# Altium PCB rp2350_led_control_pcb.PcbDoc (part 1 of 4)
Units mm, origin at the board's own origin, x right, y up, seen from the top; angles counter-clockwise.
Board outline 143.9 x 131.3 mm, 4 copper layers (L1(SIG), L2(GND), L3(PWR), L4(SIG)), stack 1.591 mm thick; 168 components, 192 nets, 814 pads, 1003 vias.
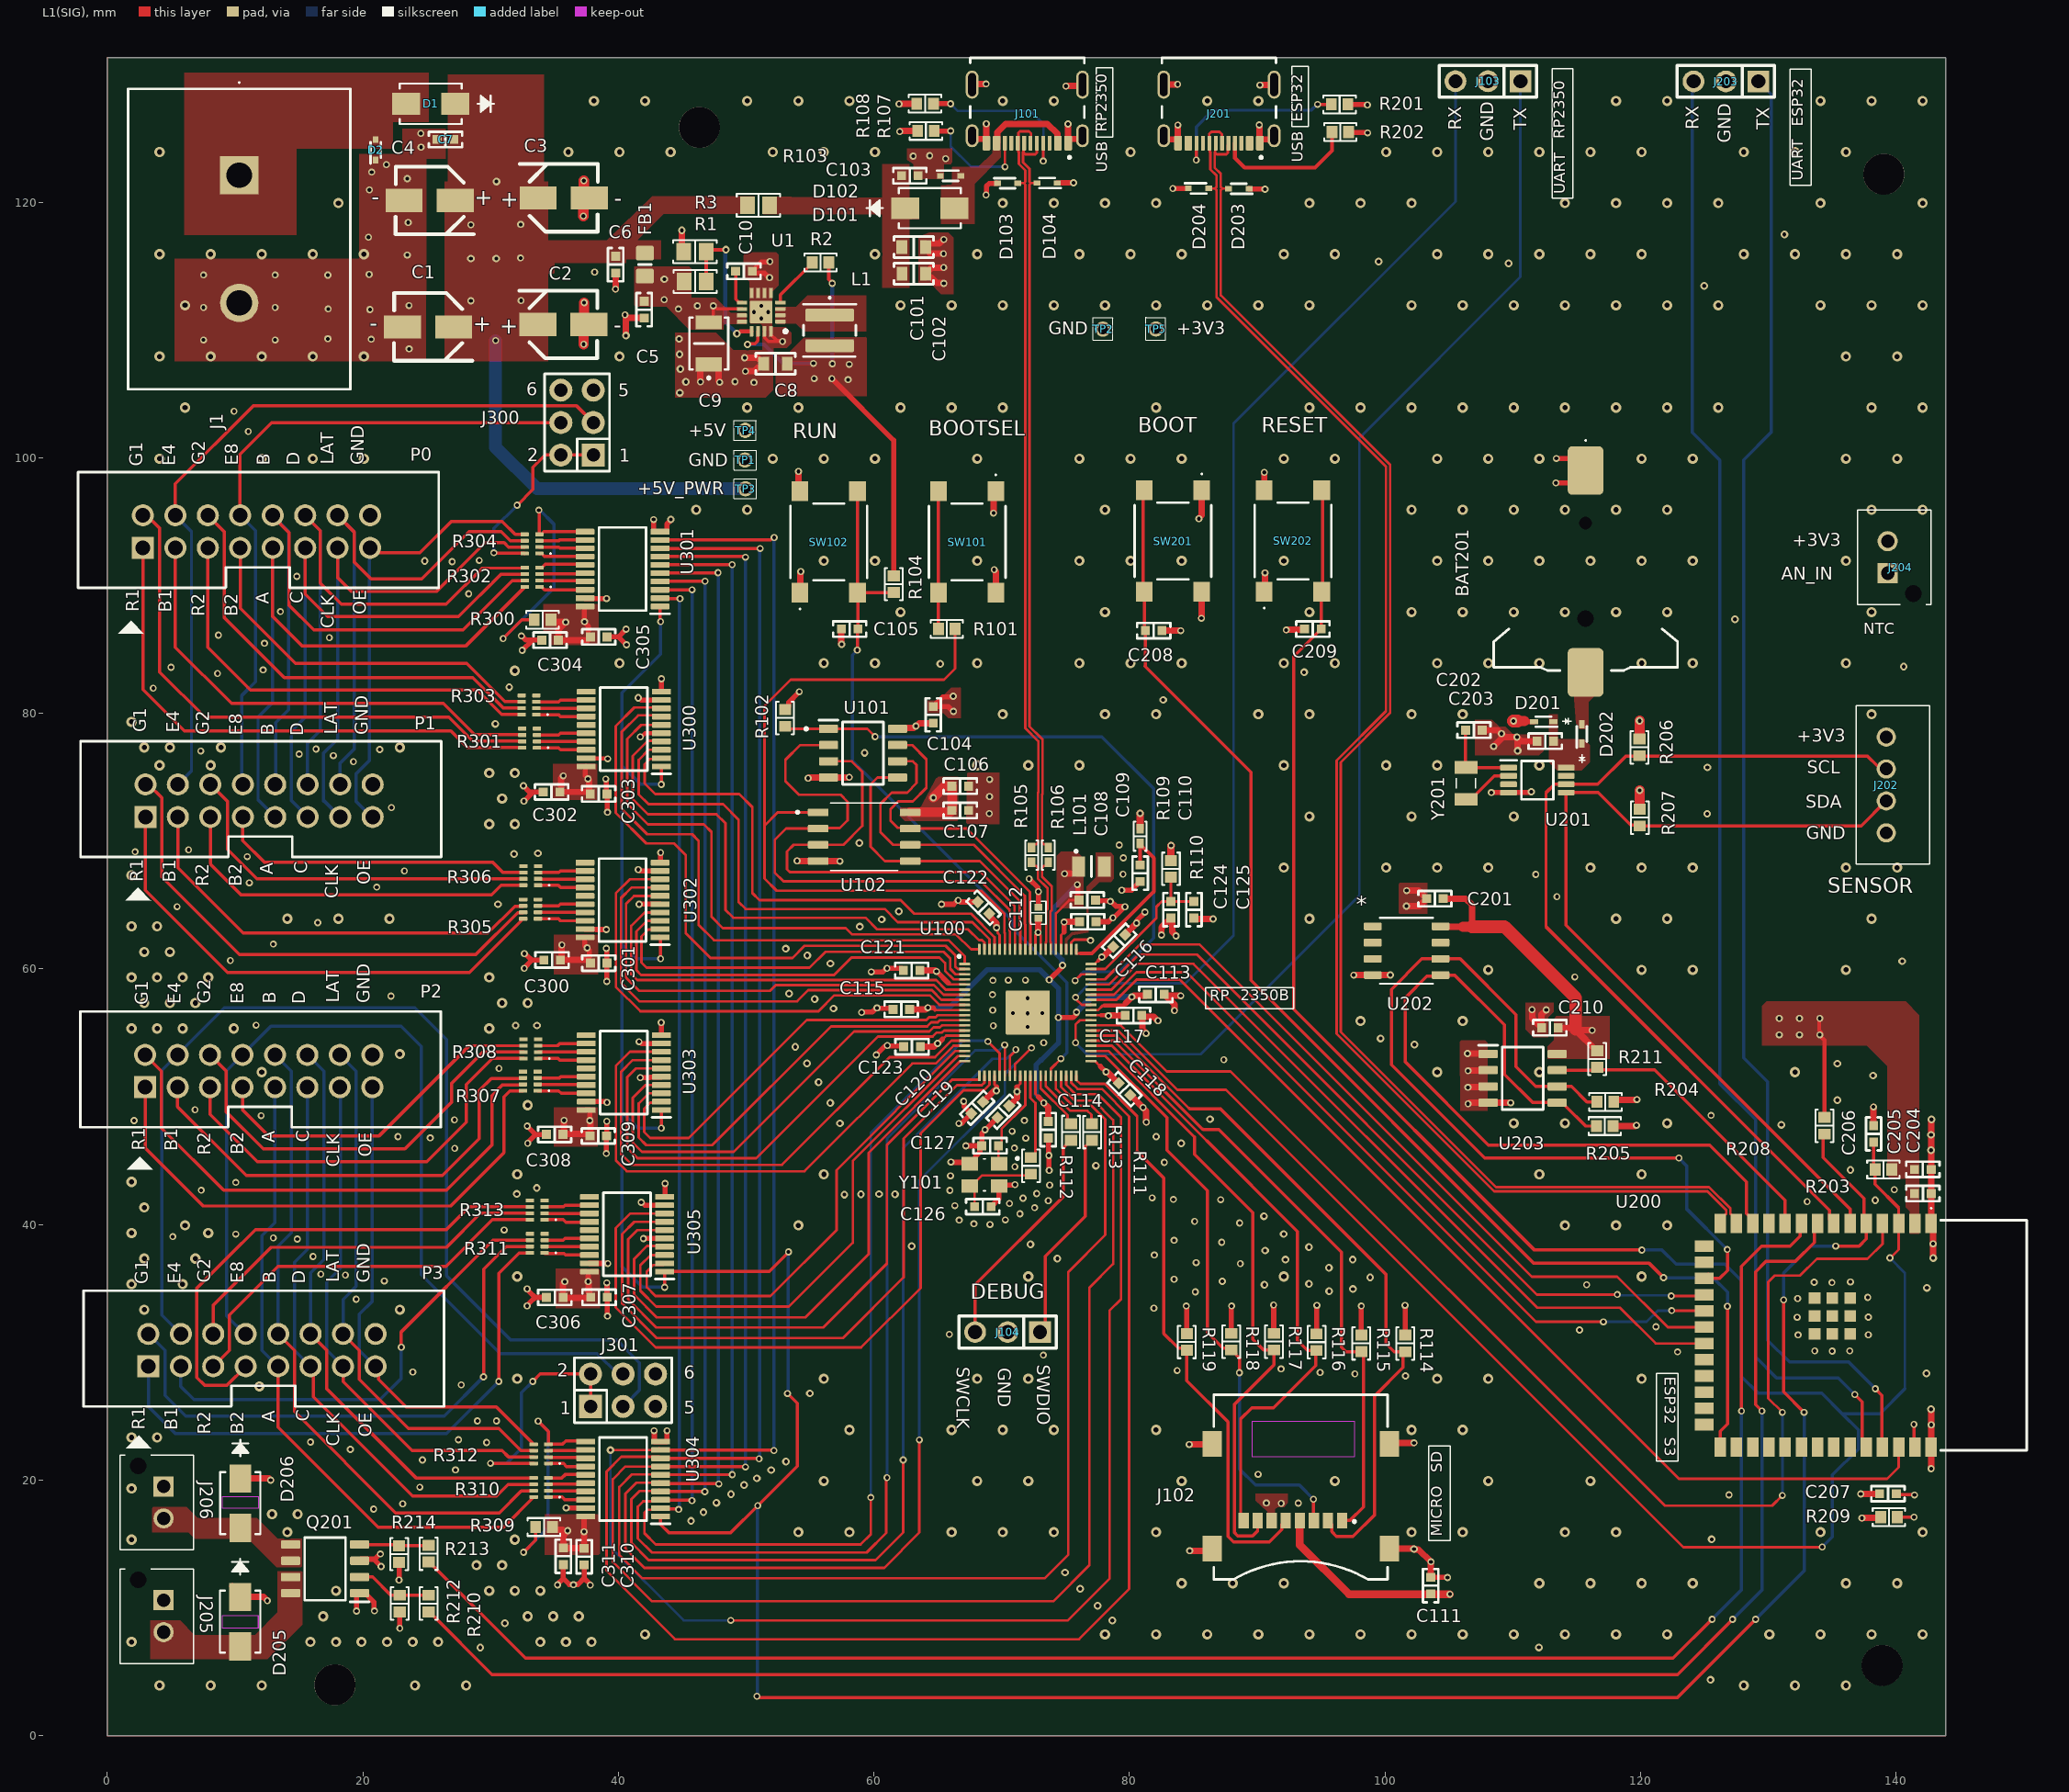
[diagram p0: L1(SIG) view]
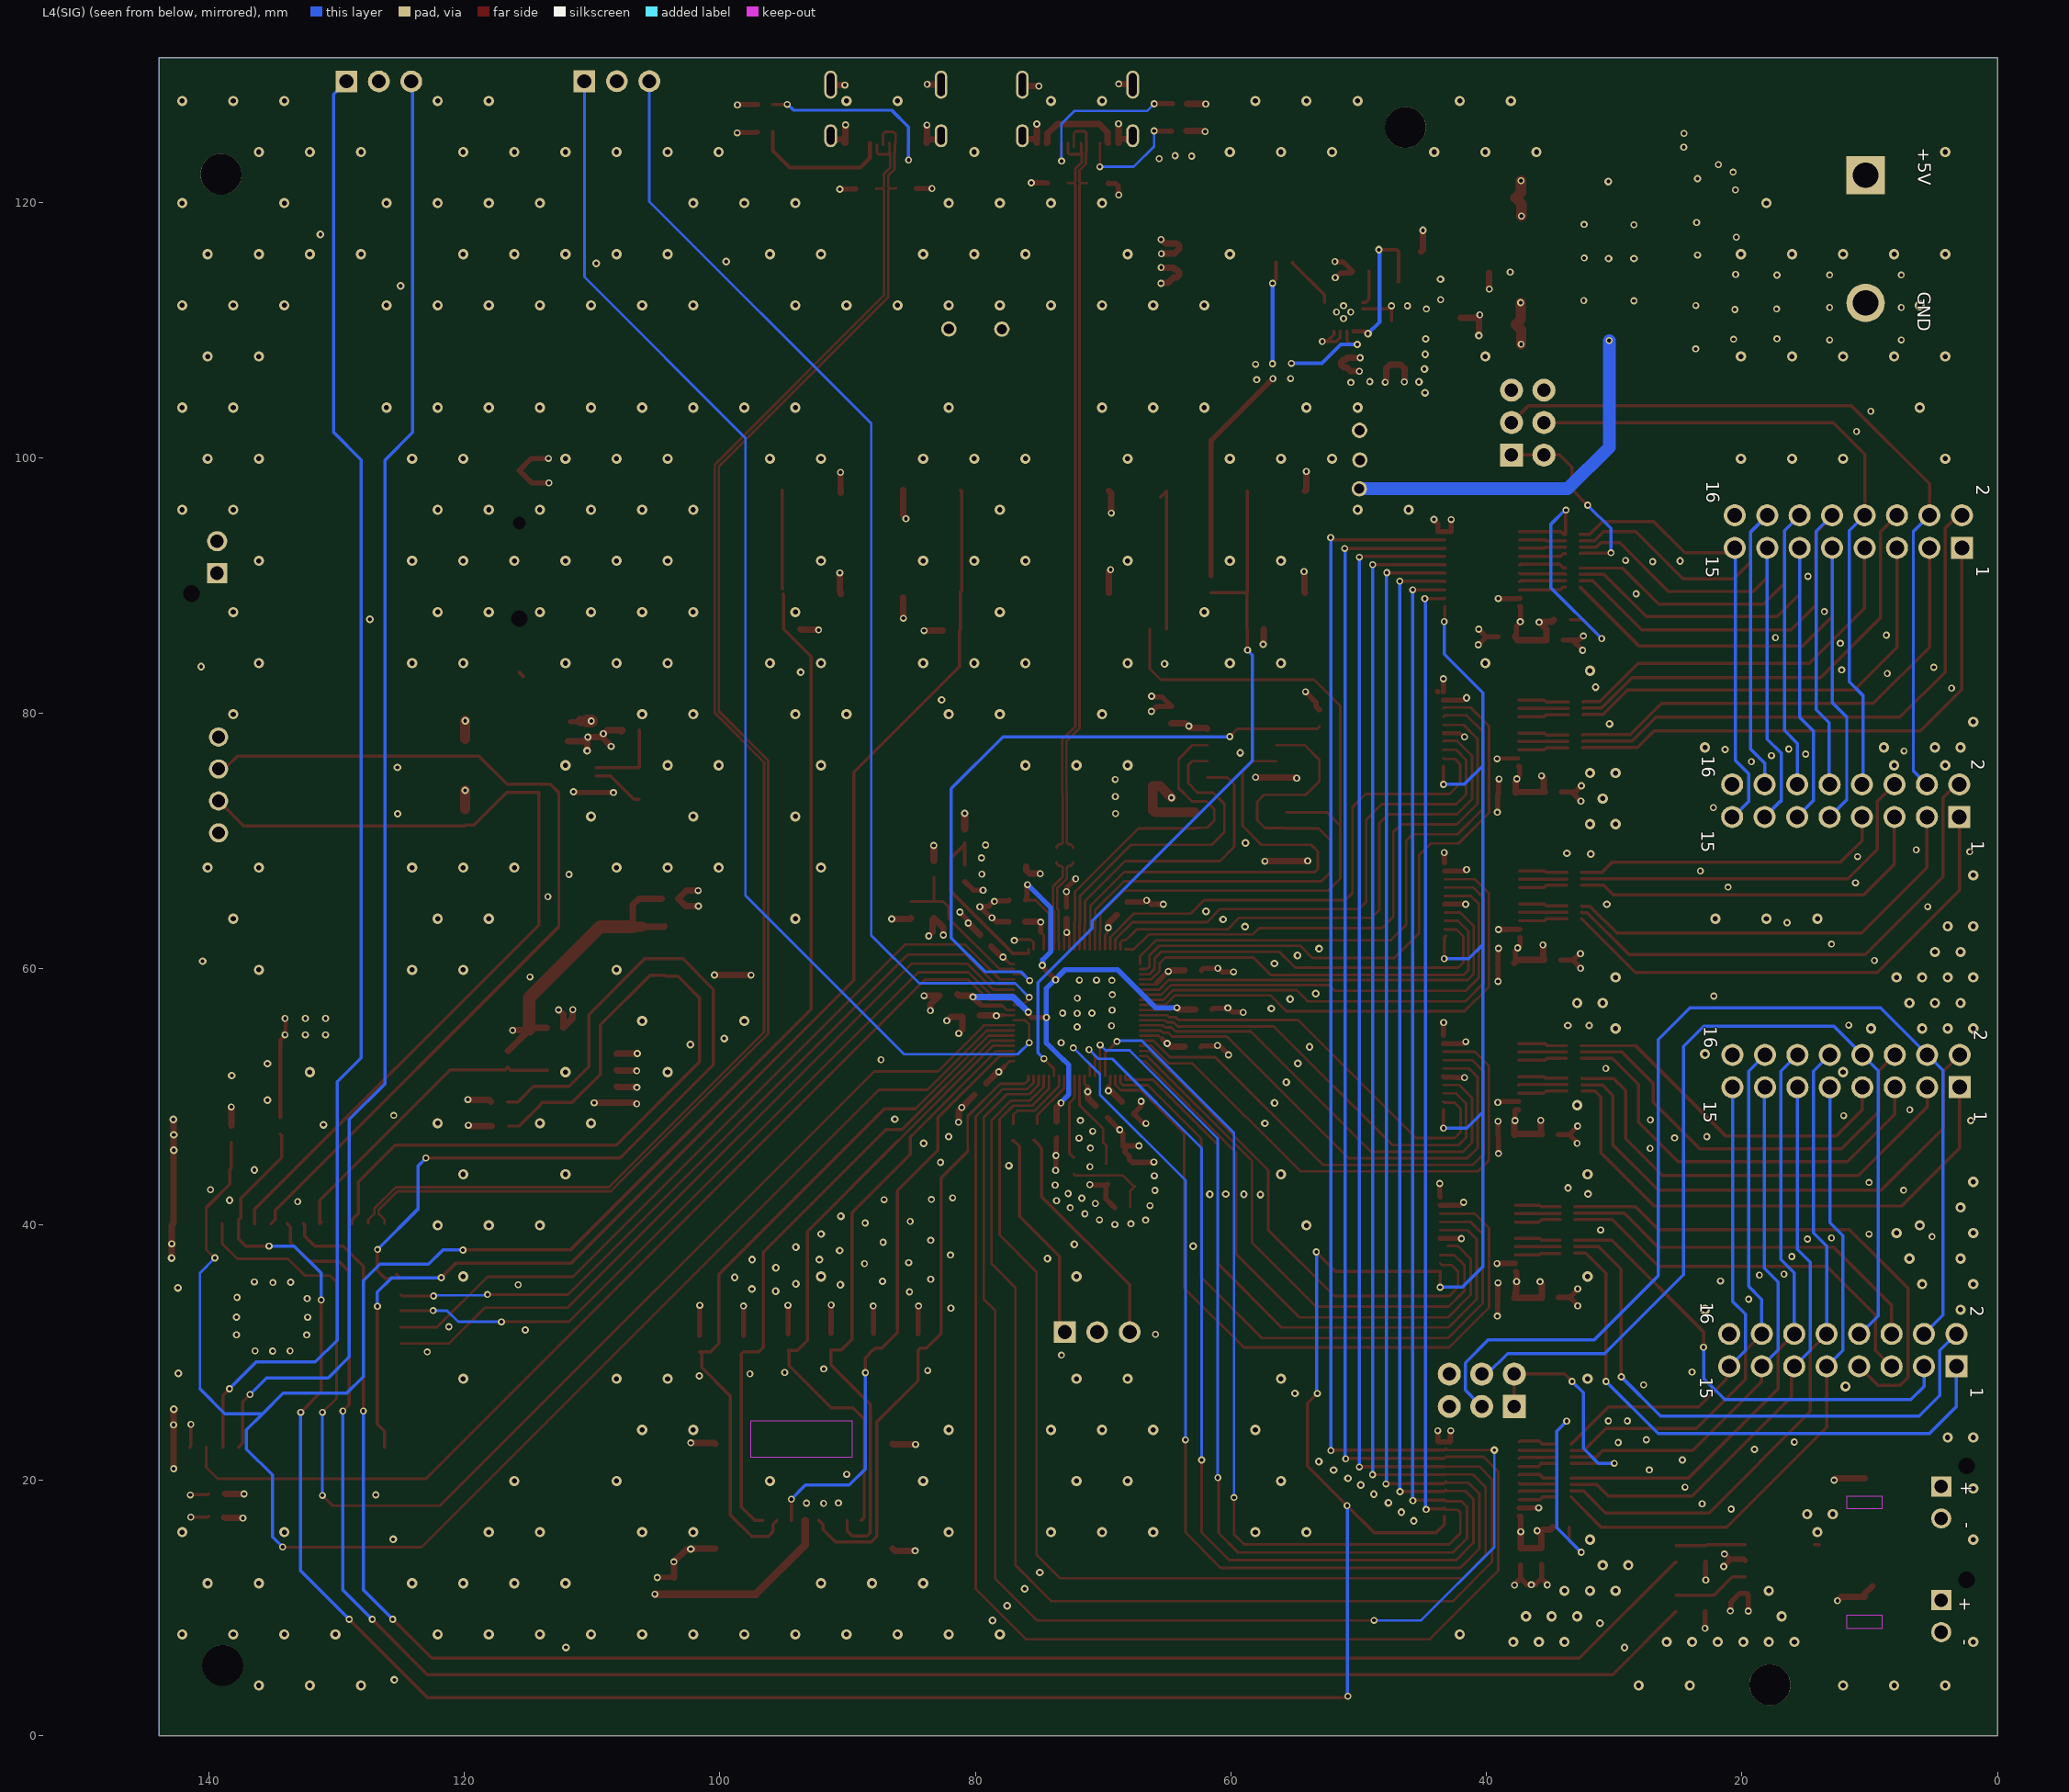
[diagram p1: L4(SIG) view, seen from below]
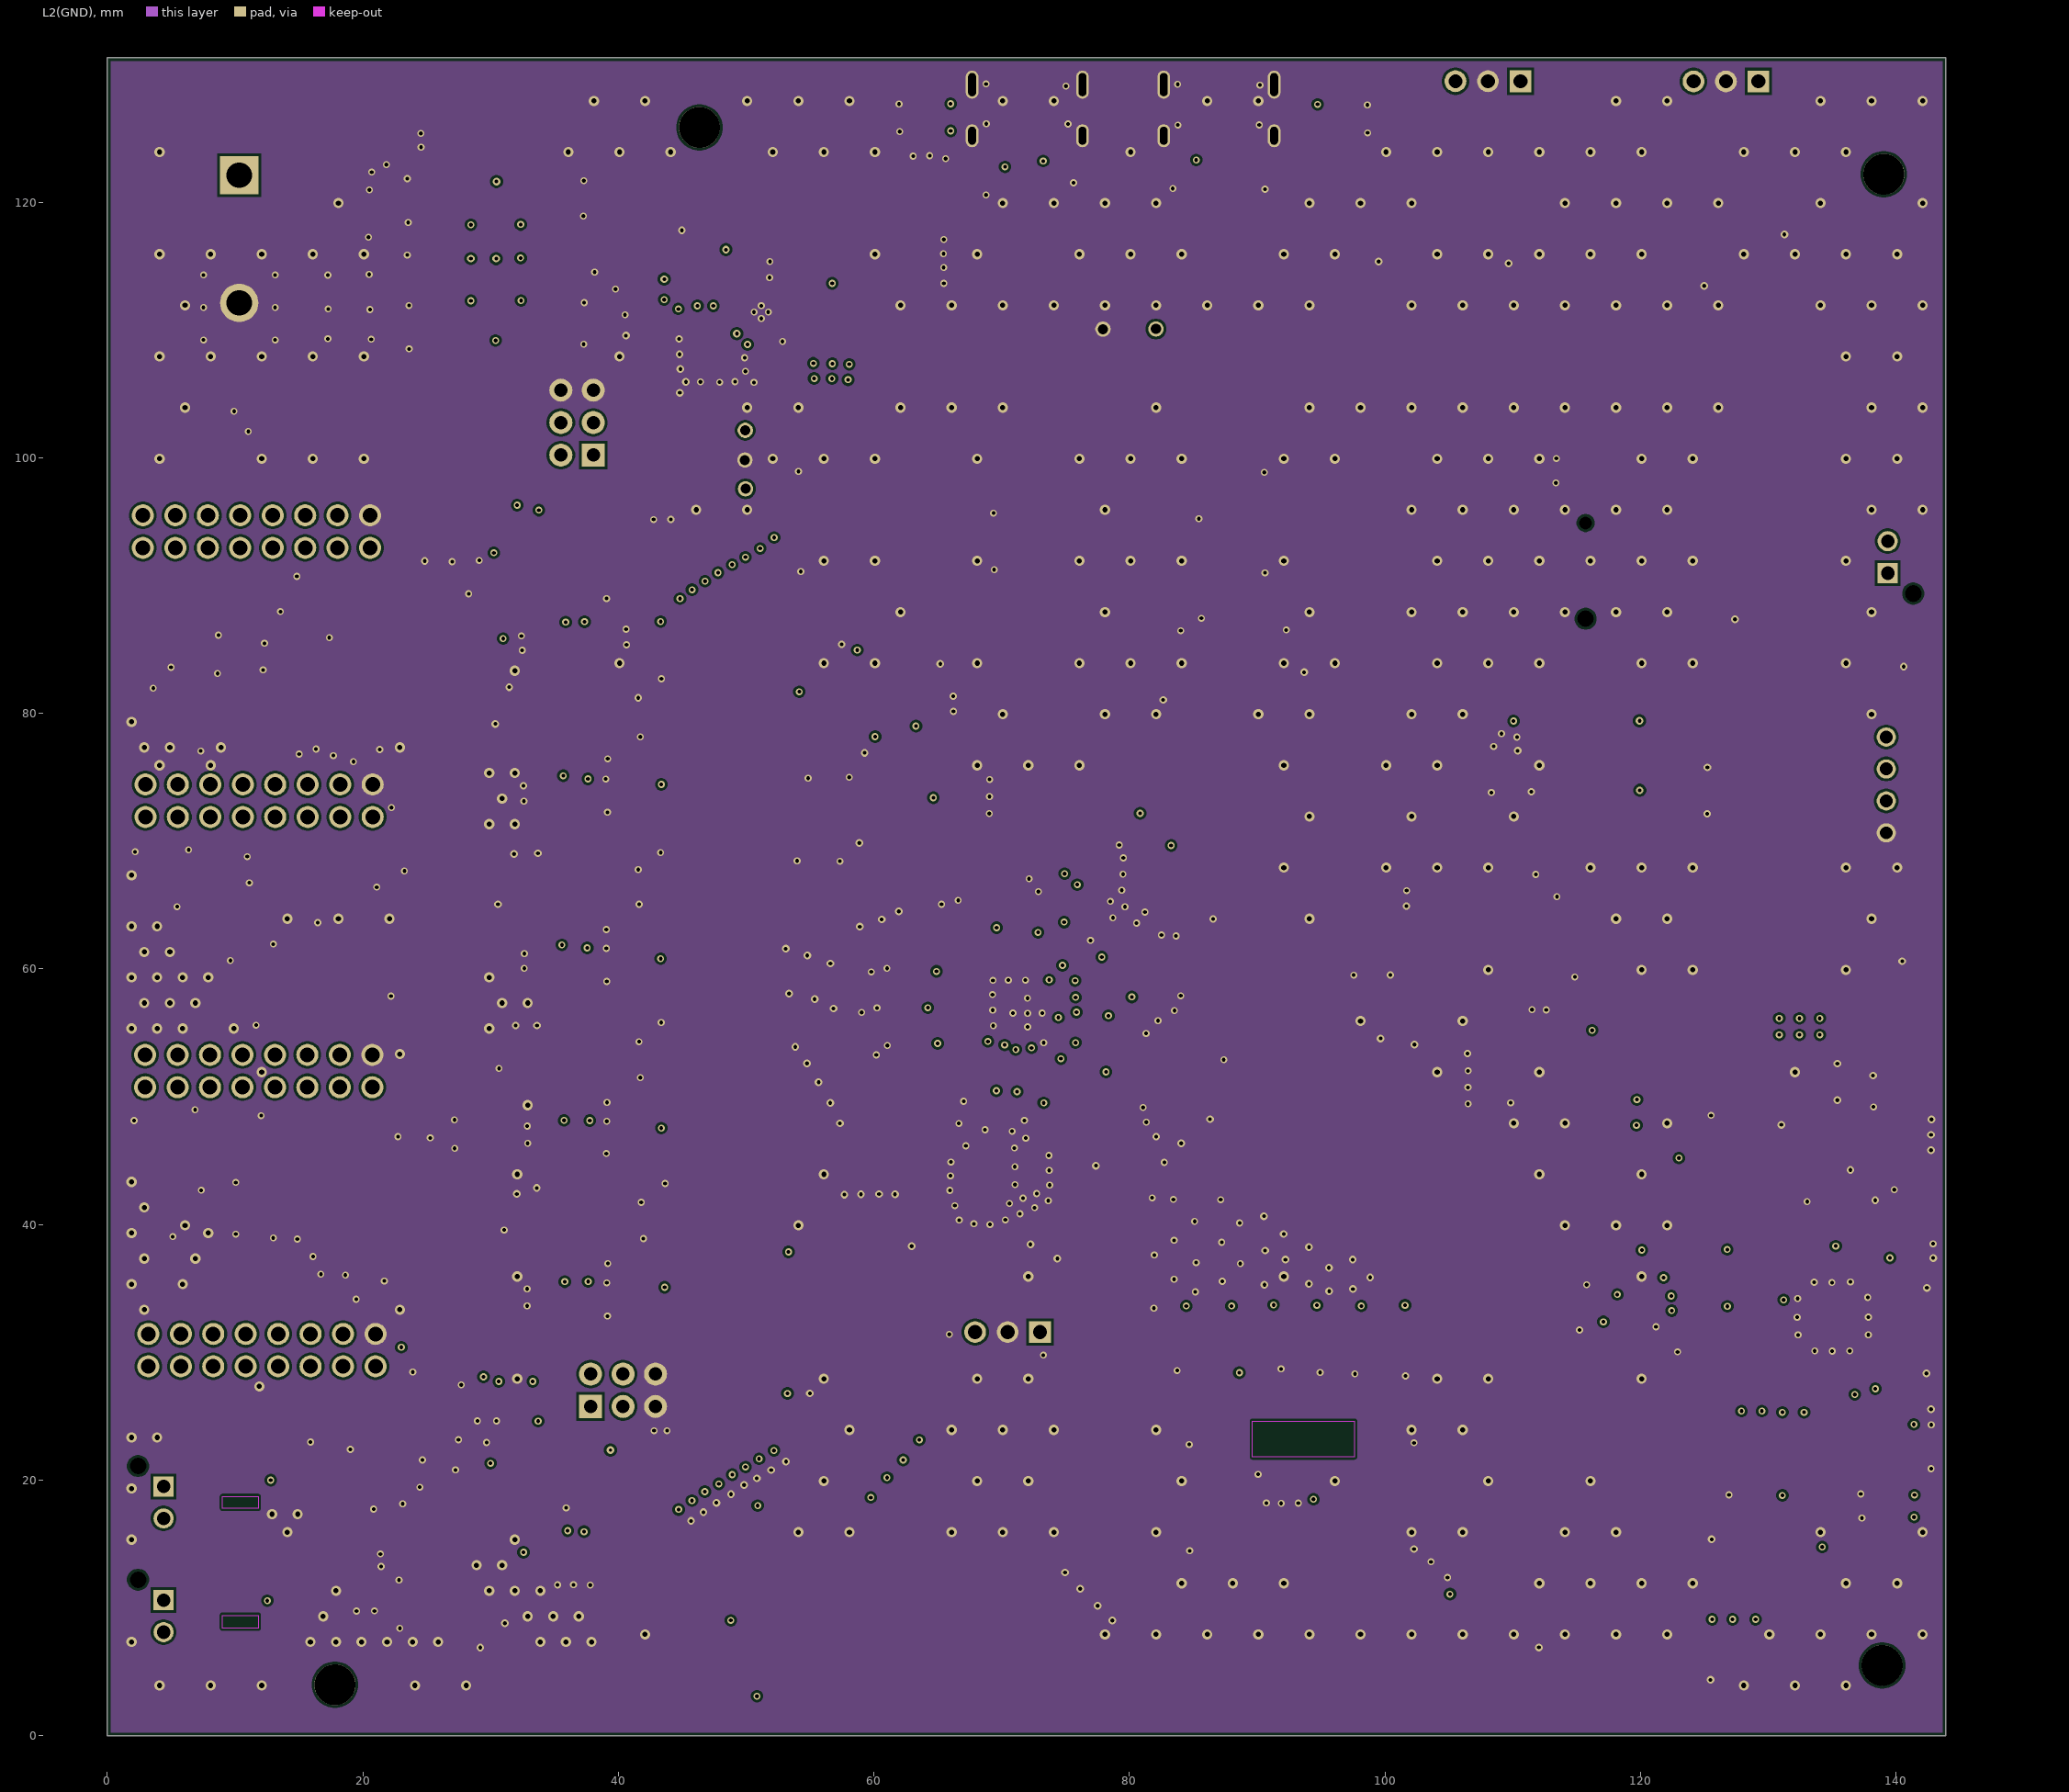
[diagram p2: L2(GND)]
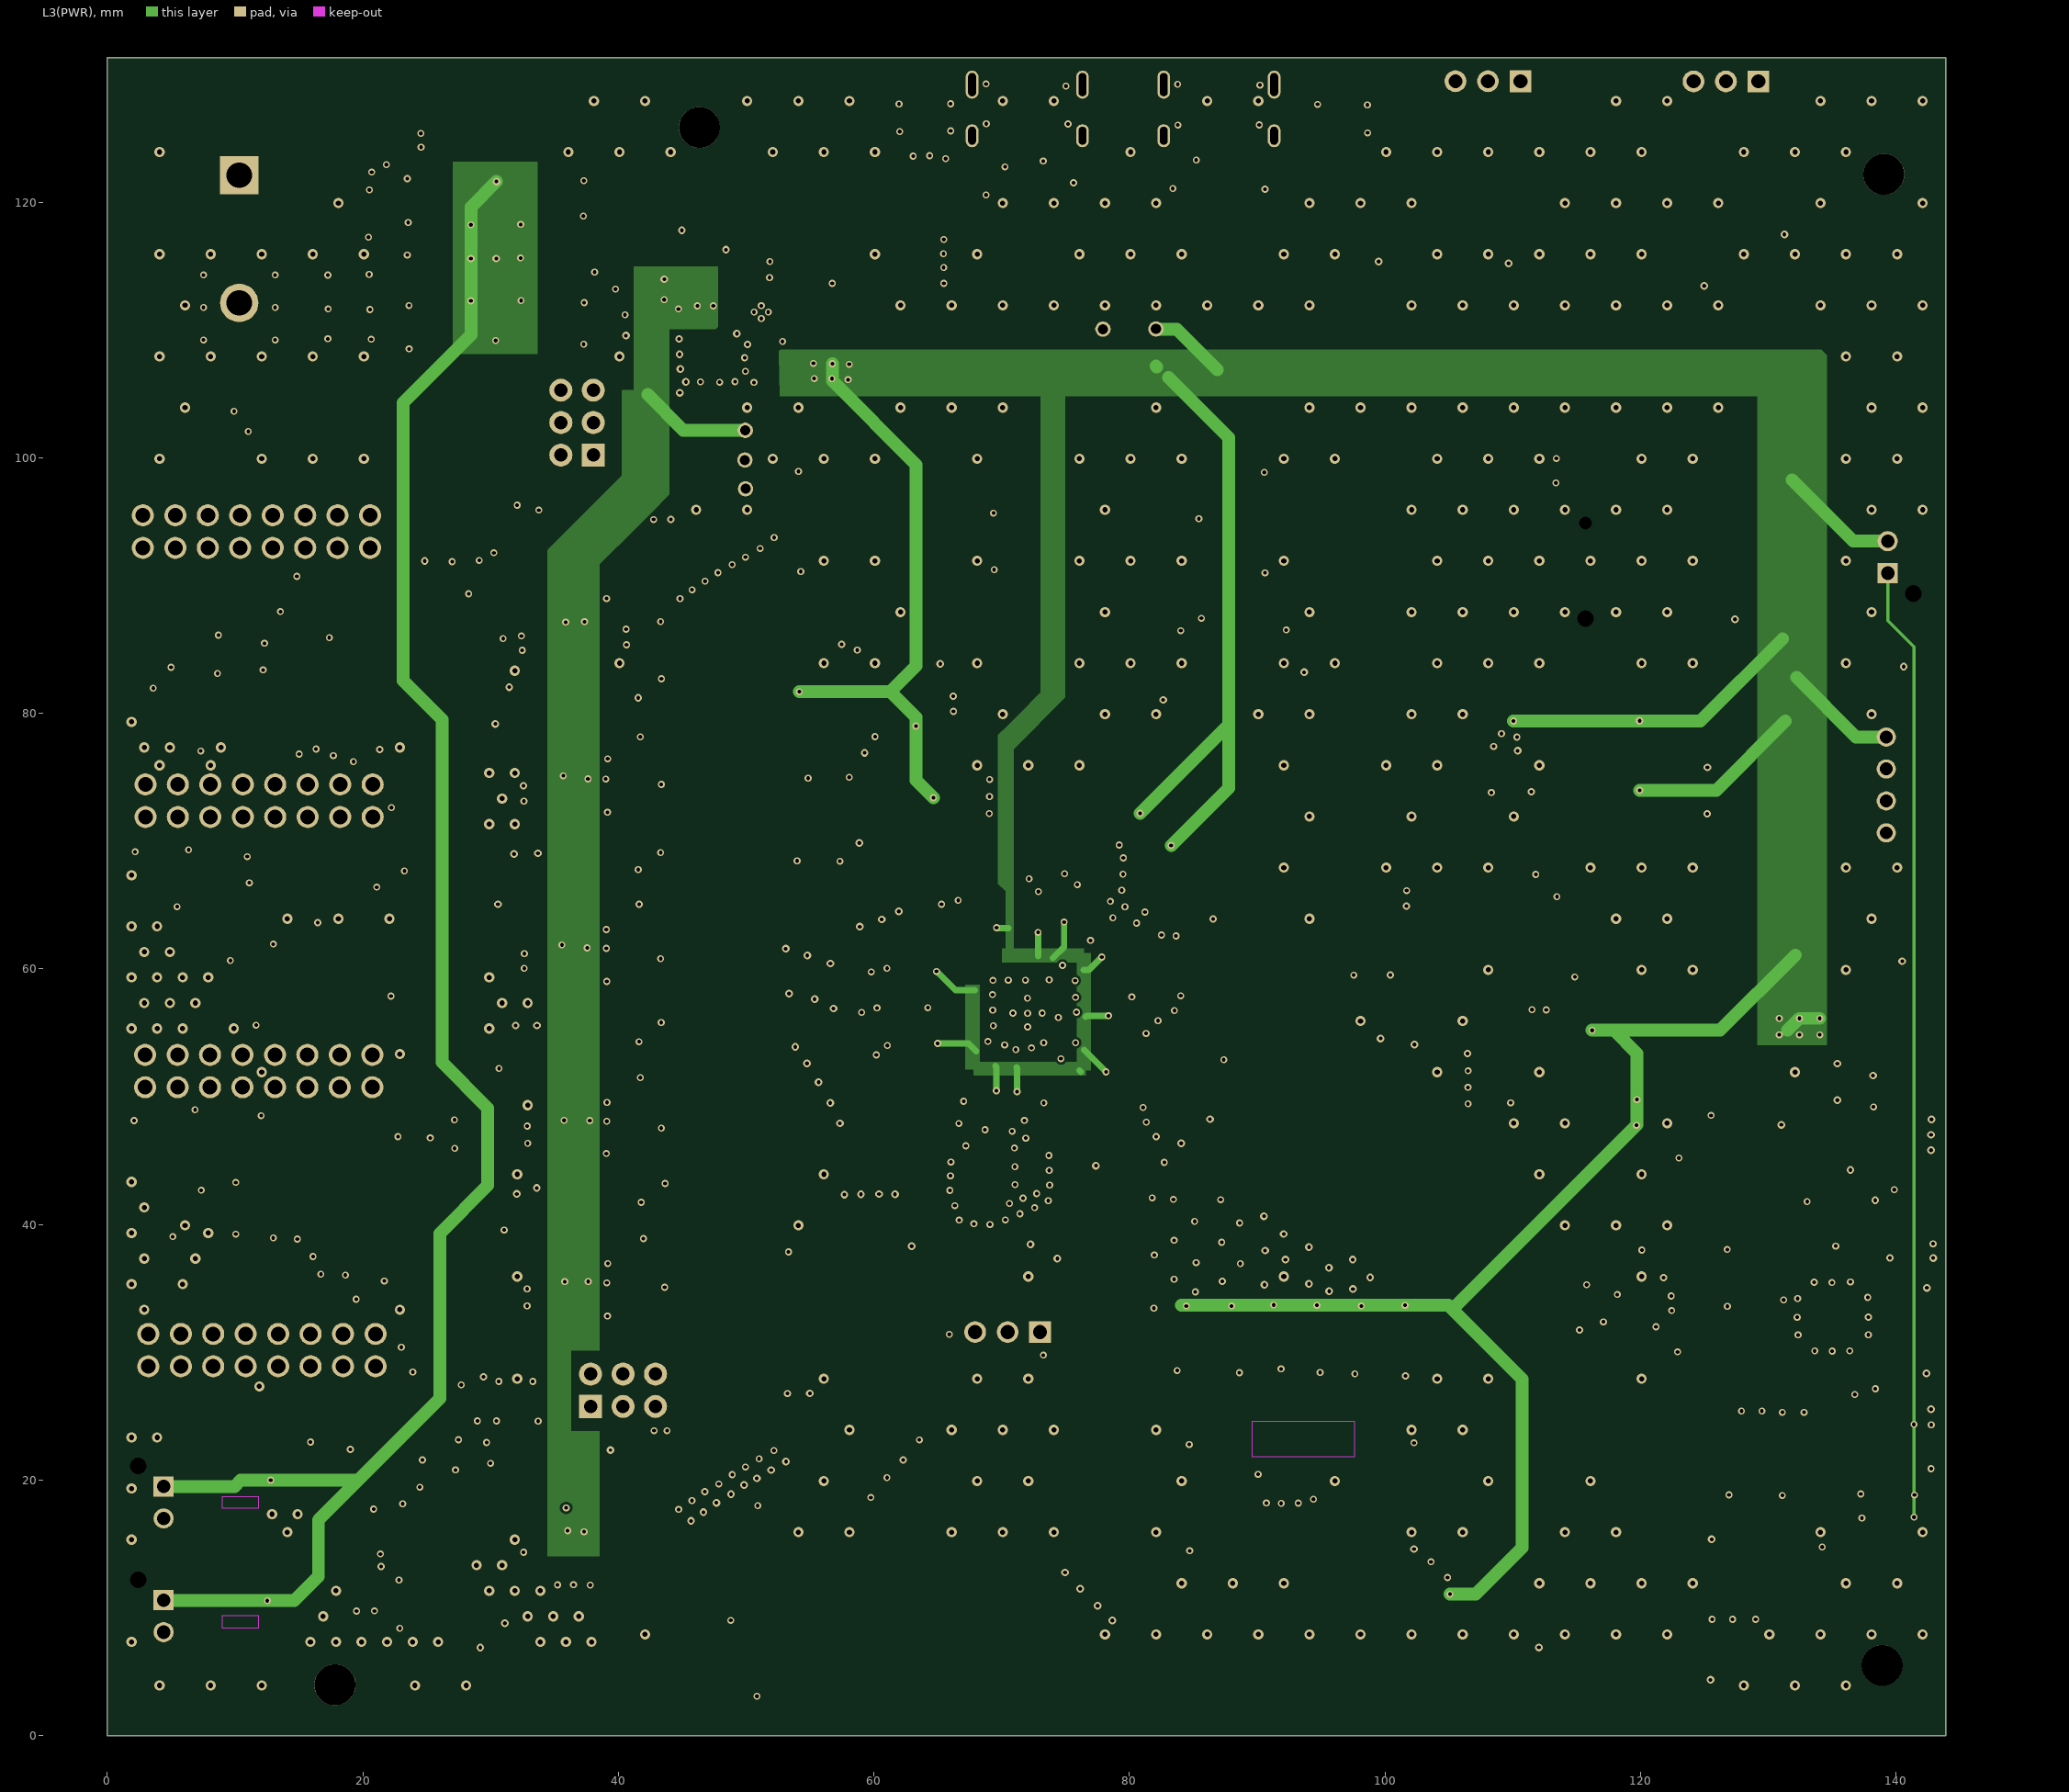
[diagram p3: L3(PWR)]

## Layer stack, top to bottom
Top Solder: solder mask 0.0254, SM-001, Dk 4
L1(SIG): signal copper 0.035
Dielectric 1: prepreg 0.2104, PP-017, Dk 4.3
L2(GND): signal copper 0.0175
Dielectric 3: core 1.065, Core-039, Dk 4.8
L3(PWR): signal copper 0.0175
Dielectric 5: prepreg 0.2104, PP-017, Dk 4.3
L4(SIG): signal copper 0.035
Bottom Solder: solder mask 0.0254, SM-001, Dk 4

## Board outline
0,5.2 0,131.3 143.9,131.3 143.9,0 0,0

## Design rules (kind name [scope] priority, off if disabled: settings)
BoardOutlineClearance [All] p1: gap=0.254 ignorepadtopadclearanceinfootprint=FALSE except(0: Arc-SplitContinuation Track-SplitContinuation SMDPad-SplitContinuation THPad-SplitContinuation Via-SplitContinuation Fill-SplitContinuation Poly-SplitContinuation Region-SplitContinuation Text-SplitContinuation)
Clearance clearence_USB_DIFF [(InDifferentialPairClass('All Differential Pairs')) vs (InDifferentialPairClass('All Differential Pairs'))] p1: gap=0.127 ignorepadtopadclearanceinfootprint=TRUE except(0: Arc-Hole Track-Hole SMDPad-Hole THPad-Hole Via-Hole Fill-Hole Poly-Hole Region-Hole Text-Hole)
Clearance Clearance_GB [All] p2: gap=0.2 ignorepadtopadclearanceinfootprint=TRUE except(0: Arc-Hole Track-Hole SMDPad-Hole THPad-Hole Via-Hole Fill-Hole Poly-Hole Region-Hole Text-Hole)
DiffPairsRouting [All] p1: maxlimit=0.254 minlimit=0.127 mostfreqgap=0.254 toplayer_maxgap=0.127 toplayer_prefgap=0.127 toplayer_minwidth=0.2 toplayer_maxwidth=0.2 toplayer_prefwidth=0.2 bottomlayer_maxgap=0.127 bottomlayer_prefgap=0.127 bottomlayer_minwidth=0.2 bottomlayer_maxwidth=0.2 bottomlayer_prefwidth=0.2 impedanceprofiledriven=TRUE impedanceprofileid={B8D868C7-B469-41A0-B801-65BF4B260559} impedanceprofilevalue=90.000000 maxuncoupledlength=12.7
HoleToHoleClearance [All] p1: gap=0.2 allowstackedmicrovias=TRUE
MinimumSolderMaskSliver Pad_to_Pad [IsPad] p1: minsoldermaskwidth=0
MinimumSolderMaskSliver [All] p2: minsoldermaskwidth=0.1
PlaneConnect [All] p1: planeconnectstyle=Direct reliefexpansion=0.508 reliefentries=4 reliefconductorwidth=0.254 reliefairgap=0.254
PolygonConnect [All] p1: connectstyle=Direct reliefconductorwidth=0.254 reliefentries=4 polygonreliefangle="90 Angle" airgapwidth=0.254
RoutingVias [All] p1: holewidth=0.3 width=0.7 viastyle="Through Hole" minholewidth=0.25 minwidth=0.5 maxholewidth=0.4 maxwidth=0.9
SilkToSolderMaskClearance [IsPad] p1: minsilkscreentomaskgap=0.01 clearancetoexposedcopper=TRUE
SolderMaskExpansion [All] p1: expansion=0.102 istentingtop=FALSE
UnRoutedNet [All] p1: checkbadconnections=TRUE
Width [All] p1: maxlimit=1 minlimit=0.2 preferedwidth=0.3 midlayer1_minwidth=0.254 midlayer1_maxwidth=0.254 midlayer1_prefwidth=0.254 minimp=50.000000 maximp=50.000000 favimp=50.000000
24 further rules are at their usual default settings.

## Classes and differential pairs
differential pair class DIFF_USB: ESP-USB USB USB-C
component class U_Wifi: BAT201 C201 C202 C203 C204 C205 C206 C207 C208 C209 C210 D201 D202 D203 D204 D205 D206 J201 J202 J203 J204 J205 J206 Q201 R201 R202 R203 R204 R205 R206 R207 R208 R209 R210 R211 R212 R213 R214 SW201 SW202 U200 U201 U202 U203 Y201
component class U_RP2350: C101 C102 C103 C104 C105 C107 C109 C111 C113 C115 C117 C119 C121 C123 C125 C127 D101 D102 D103 D104 J101 J102 J103 J104 L101 R101 R102 R104 R106 R108 R110 R113 R114 R116 R118 R119 SW101 SW102 U100 U101 U102 Y101
component class U_HUB75: C300 C301 C302 C303 C304 C305 C306 C307 C308 C309 C310 C311 J300 J301 P0 P1 P2 P3 R300 R301 R302 R303 R304 R305 R306 R307 R308 R309 R310 R311 R312 R313 U300 U301 U302 U303 U304 U305
component class Designator: C1 C3 C5 C6 C7 C8 C9 C10 D1 D2 FB1 J1 L1 R1 R2 R3 TP1 TP2 TP3 TP4 TP5 U1
differential pair USB: +USB_P -USB_N
differential pair USB-C: +USB-C_P -USB-C_N
differential pair ESP-USB: +ESP-USB_P -ESP-USB_N

## Components (designator, comment, footprint, x,y, rotation, side; value= is the part's Value field where it differs from the comment)
BAT201 "1056" 1056 115.7,91.1 r270 top
C1 "875105359003" CAPAE530X580N 25.104,110.246 r180 top value=22uF
C2 "875105359003" CAPAE530X580N 35.688,110.43 r0 top value=22uF
C3 "875105359003" CAPAE530X580N 35.72,120.336 r0 top value=22uF
C4 "875105359003" CAPAE530X580N 25.218,120.133 r180 top value=22uF
C5 "10uF" C0603 42.011,111.588 r90 top
C6 "10uF" C0603 39.784,115.114 r90 top
C7 "100nF" C0603 26.464,124.908 r0 top
C8 "22uF" C0805 52.291,107.365 r0 top
C9 "10uF" C1210 47.075,108.944 r90 top
C10 "3300pF" C0603 49.825,114.594 r180 top
C101 "22uF" C0805 63.116,114.407 r180 top
C102 "22uF" C0805 63.111,116.48 r180 top
C103 "100nF" C0603 62.806,122.068 r180 top
C104 "100nF" C0603 64.642,79.882 r270 top
C105 "100nF" C0603 58.1,86.6 r0 top
C106 "4u7F" C0603 66.75,74.3 r180 top
C107 "100nF" C0603 66.75,72.4 r180 top
C108 "4u7F" C0603 76.7,65.385 r180 top
C109 "4u7F" C0603 76.73,63.694 r180 top
C110 "4u7F" C0603 80.835,67.49 r90 top
C111 "10uF" C0603 103.574,11.739 r270 top
C112 "100nF" C0402 72.862,64.397 r270 top
C113 "100nF" C0603 82.061,58.012 r180 top
C114 "100nF" C0603 73.635,47.417 r90 top
C115 "100nF" C0603 62.138,56.837 r0 top
C116 "100nF" C0603 79.2,62.2 r225 top
C117 "100nF" C0603 80.312,56.358 r180 top
C118 "100nF" C0603 79.61,50.593 r135 top
C119 "100nF" C0603 70.126,48.823 r45 top
C120 "100nF" C0603 68.078,49.131 r45 top
C121 "100nF" C0603 62.953,59.883 r0 top
C122 "100nF" C0603 68.577,64.78 r315 top
C123 "100nF" C0603 62.976,53.913 r0 top
C124 "100nF" C0603 83.242,64.632 r90 top
C125 "4u7F" C0603 85.042,64.632 r90 top
C126 "15pF" C0603 68.519,41.392 r180 top
C127 "15pF" C0603 69.089,46.158 r0 top
C201 "100nF" C0603 103.9,65.5 r0 top
C202 "100nF" C0603 112.54,77.822 r0 top
C203 "22pF" C0603 106.958,78.688 r0 top
C204 "10uF" C0603 142.095,44.311 r180 top
C205 "100nF" C0603 142.098,42.425 r180 top
C206 "1uF" C0603 138.239,47.089 r270 top
C207 "100nF" C0603 139.366,18.931 r0 top
C208 "100nF" C0603 81.894,86.475 r180 top
C209 "100nF" C0603 94.35,86.6 r0 top
C210 "100nF" C0603 112.9,55.4 r0 top
C300 "1uF" C0603 34.809,60.701 r0 top
C301 "100nF" C0603 38.462,60.45 r180 top
C302 "1uF" C0603 34.765,73.846 r0 top
C303 "100nF" C0603 38.451,73.689 r180 top
C304 "1uF" C0603 34.65,85.731 r0 top
C305 "100nF" C0603 38.457,85.978 r180 top
C306 "1uF" C0603 35.02,34.296 r0 top
C307 "100nF" C0603 38.48,34.309 r180 top
C308 "1uF" C0603 35.011,47.048 r0 top
C309 "100nF" C0603 38.422,46.929 r180 top
C310 "1uF" C0603 35.686,14.038 r90 top
C311 "100nF" C0603 37.312,14.004 r90 top
D1 "STPS2L30A" SMA_STM#1 25.306,127.702 r180 top
D2 "PESD5V0S1BB_115" SODFL1608X65N 21,124.1 r90 top
D101 "STPS2L30A" SMA_STM#1 64.37,119.528 r0 top
D102 "PESD5V0S1BB_115" SODFL1608X65N 65.996,122.068 r0 top
D103 "PESD5V0S1BB_115" SODFL1608X65N 70.46,121.486 r0 top
D104 "PESD5V0S1BB_115" SODFL1608X65N 73.552,121.5 r180 top
D201 "RB751S40T1G" SODFL1608X70N 112.416,79.346 r180 top
D202 "RB751S40T1G" SODFL1608X70N 115.408,78.388 r90 top
D203 "PESD5V0S1BB_115" SODFL1608X65N 88.555,121.049 r180 top
D204 "PESD5V0S1BB_115" SODFL1608X65N 85.406,121.08 r0 top
D205 "STPS2L30A" SMA_STM#2 10.396,8.92 r270 top
D206 "STPS2L30A" SMA_STM#3 10.406,18.193 r270 top
FB1 "MH2029-601Y" BEADC2012X110N 42.072,115.111 r270 top
J1 "YK6010223000G" YK6010223000G 10.32,122.114 r270 top
J101 "USB4215-03-A" GCT_USB4215-03-A_REVA 72,129.2 r180 top
J102 "MEM2067-02-180-00-A" GCT_MEM2067-02-180-00-A_REVB 93.405,19.456 r0 top
J103 "DS1021-1x3SF11-B" HDR-TH_3P-P2.54-V-M 110.596,129.463 r180 top value=?
J104 "DS1021-1x3SF11-B" HDR-TH_3P-P2.54-V-M 73.001,31.584 r180 top value=?
J201 "USB4215-03-A" GCT_USB4215-03-A_REVA 87,129.2 r180 top
J202 "B4B-XH-A_LF__SN_" B4BXHALFSN 139.225,78.147 r270 top
J203 "DS1021-1x3SF11-B" HDR-TH_3P-P2.54-V-M 129.223,129.454 r180 top value=?
J204 "B2B-XH-AM_LF__SN_" B2BXHAMLFSN 139.343,90.974 r270 top
J205 "B2B-XH-AM_LF__SN_" B2BXHAMLFSN 4.4,10.6 r90 top
J206 "B2B-XH-AM_LF__SN_" B2BXHAMLFSN 4.4,19.5 r90 top
J300 "ZX-PZ2.54-2-3PZZ" HDR-TH_6P-P2.54-V-M-R2-C3-S2.54-1 38.033,100.212 r90 top value=?
J301 "ZX-PZ2.54-2-3PZZ" HDR-TH_6P-P2.54-V-M-R2-C3-S2.54-1 37.82,25.76 r0 top value=?
L1 "SRP4020FA-2R2M" SRP4020FA2R2M 56.538,109.97 r0 top
L101 "AOTA-B201610S3R3-101-T" AOTAB201610S3R3101T 77.015,68.007 r0 top
P0 "302-S161" SHDR16W66P254_2X8_2792X905X905P 2.78,92.95 r0 top
P1 "302-S161" SHDR16W66P254_2X8_2792X905X905P 2.98,71.89 r0 top
P2 "302-S161" SHDR16W66P254_2X8_2792X905X905P 2.954,50.74 r0 top
P3 "302-S161" SHDR16W66P254_2X8_2792X905X905P 3.208,28.896 r0 top
Q201 "9926A-GK" SOIC127P600X175-8N 17.042,13.05 r180 top
R1 "10K" R0805_2012 46.007,113.786 r0 top
R2 "100K" R0603_1608 55.815,115.288 r0 top
R3 "DNP" R0805_2012 45.994,116.128 r180 top
R101 "1K" R0603_1608 65.7,86.6 r180 top
R102 "10K" R0603_1608 53.042,79.636 r90 top
R103 "DNP" R0805_2012 50.961,119.76 r180 top
R104 "10K" R0603_1608 61.542,90.11 r270 top
R105 "27R" R0402_1005 72.342,68.907 r270 top
R106 "27R" R0402_1005 73.642,68.907 r270 top
R107 "4K7" R0603_1608 64.067,125.575 r0 top
R108 "4K7" R0603_1608 63.999,127.703 r0 top
R109 "33R" R0402_1005 80.835,70.39 r90 top
R110 "200R" R0603_1608 83.242,67.832 r90 top
R111 "100" R0603_1608 77.064,47.227 r270 top
R112 "1K" R0603_1608 72.286,44.589 r270 top
R113 "100" R0603_1608 75.422,47.238 r270 top
R114 "10K" R0603_1608 101.583,30.688 r270 top
R115 "10K" R0603_1608 98.146,30.698 r270 top
R116 "10K" R0603_1608 94.636,30.792 r270 top
R117 "10K" R0603_1608 91.299,30.831 r270 top
R118 "10K" R0603_1608 87.97,30.831 r270 top
R119 "10K" R0603_1608 84.486,30.805 r270 top
R201 "4K7" R0603_1608 96.448,127.658 r180 top
R202 "4K7" R0603_1608 96.5,125.495 r180 top
R203 "10K" R0603_1608 139.01,44.309 r180 top
R204 "10K" R0603_1608 117.25,49.6 r180 top
R205 "10K" R0603_1608 117.2,47.7 r180 top
R206 "10K" R0603_1608 119.92,77.34 r270 top
R207 "10K" R0603_1608 119.936,71.841 r270 top
R208 "10K" R0603_1608 134.393,47.726 r270 top
R209 "10K" R0603_1608 139.439,17.097 r180 top
R210 "10K" R0603_1608 22.884,10.337 r90 top
R211 "10K" R0603_1608 116.6,52.95 r270 top
R212 "1K" R0603_1608 25.151,10.337 r90 top
R213 "1K" R0603_1608 25.151,14.234 r90 top
R214 "10K" R0603_1608 22.833,14.209 r270 top
R300 "10K" R0603_1608 34.065,87.323 r0 top
R301 "YC124-FR-0733RL" YC124FR0733RL 33.046,78.055 r90 top
R302 "YC124-FR-0733RL" YC124FR0733RL 33.245,90.64 r90 top
R303 "YC124-FR-0733RL" YC124FR0733RL 33.009,80.649 r90 top
R304 "YC124-FR-0733RL" YC124FR0733RL 33.233,93.259 r90 top
R305 "YC124-FR-0733RL" YC124FR0733RL 33.121,64.68 r90 top
R306 "YC124-FR-0733RL" YC124FR0733RL 33.131,67.298 r90 top
R307 "YC124-FR-0733RL" YC124FR0733RL 33.105,51.209 r90 top
R308 "YC124-FR-0733RL" YC124FR0733RL 33.145,53.74 r90 top
R309 "10K" R0603_1608 34.169,16.325 r0 top
R310 "YC124-FR-0733RL" YC124FR0733RL 33.948,19.418 r90 top
R311 "YC124-FR-0733RL" YC124FR0733RL 33.653,38.523 r90 top
R312 "YC124-FR-0733RL" YC124FR0733RL 33.948,22.047 r90 top
R313 "YC124-FR-0733RL" YC124FR0733RL 33.653,41.128 r90 top
SW101 "PTS645SM43SMTR92_LFS" PTS645SM43SMTR92LFS 67.292,93.412 r270 top
SW102 "PTS645SM43SMTR92_LFS" PTS645SM43SMTR92LFS 56.462,93.412 r90 top
SW201 "PTS645SM43SMTR92_LFS" PTS645SM43SMTR92LFS 83.405,93.486 r270 top
SW202 "PTS645SM43SMTR92_LFS" PTS645SM43SMTR92LFS 92.793,93.486 r90 top
TP1 "GND" "Test point SDT8" 49.888,99.828 r0 top value=?
TP2 "GND" "Test point SDT8" 77.915,110.054 r90 top value=?
TP3 "+5V_IN" "Test point SDT8" 49.958,97.567 r180 top value=?
TP4 "+5V" "Test point SDT8" 49.935,102.14 r180 top value=?
TP5 "+3V3" "Test point SDT8" 82.063,110.067 r90 top value=?
U1 "TPS62142RGTR" QFN50P300X300X100-17N-D 51.175,111.394 r180 top
U100 "RP2350B" QFN40P1000X1000X90-81N-D 72.042,56.582 r0 top
U101 "APS6404L-3SQR-SN" SOIC127P600X175-8N 59.142,76.882 r0 top
U102 "W25Q128JVSIQ" SOIC127P790X216-8N 59.237,70.347 r0 top
U200 "ESP32-S3-WROOM-1-N16R8" ESP32S3WROOM1N16R8 137.484,31.326 r270 top
U201 "PCF8563TS_5_118" SOT65P490X110-8N 111.92,74.774 r0 top
U202 "ATECC608C-SSHDA-T" SOIC8_SWB_MCH 101.688,61.422 r0 top
U203 "AT24C256C-SSHL-T" 24LC32A 110.774,51.44 r0 top
U300 "SN74AHCT541PWR" SOP65P640X120-20N 40.42,78.768 r180 top
U301 "SN74AHCT541PWR" SOP65P640X120-20N 40.32,91.29 r180 top
U302 "SN74AHCT541PWR" SOP65P640X120-20N 40.32,65.39 r180 top
U303 "SN74AHCT541PWR" SOP65P640X120-20N 40.42,51.89 r180 top
U304 "SN74AHCT541PWR" SOP65P640X120-20N 40.366,20.082 r180 top
U305 "SN74AHCT541PWR" SOP65P640X120-20N 40.674,39.236 r180 top
Y101 "ABM8-272-T3" XTAL_ABM8-272-T3 68.644,43.882 r270 top
Y201 "FC-135R_32.7680KA-A3" FC135R327680KAA3 106.332,74.52 r90 top

## Footprints (in the part's own frame and the unit in brackets; to place one, negate y for a bottom-side part, rotate by r counter-clockwise, add the part's x,y. Pads: shape width x height; smd on the part's side, far side on the other; paste and mask are expansions set on the pad)
24LC32A [mm]
  rrect25% 1.5x0.65 smd: 1(-2.7,1.905) 2(-2.7,0.635) 3(-2.7,-0.635) 4(-2.7,-1.905) 5(2.7,-1.905) 6(2.7,-0.635) 7(2.7,0.635) 8(2.7,1.905)
  silkscreen extent -3.45,-2.45 1.6,2.58, body extent -3,-2.45 3,2.45, height 1.75
1056 [mm]
  round 0.5 hole 1 unplated: 1(-3.8,0)
  round 0.65 hole 1.3 unplated: 2(3.7,0)
  rrect25% 3.8x2.8 smd: N(-7.9,0) P(7.9,0)
  silkscreen extent -10.3,-7.2 7.75,7.2, body extent -9.6,-7.46 9.2,7.67, height 4.23
AOTAB201610S3R3101T [mm]
  rect 1x1.6 smd: 1(-1,0) 2(1,0)
  silkscreen extent -1.3,-0.8 0,1.3, body extent -1,-0.8 1,0.8, height 1
B2BXHAMLFSN [mm]
  rect 1.575x1.575 hole 1.05: 1(0,0)
  round 1.575 hole 1.05: 2(-2.5,0)
  round 0.65 hole 1.3 unplated: MH1(1.6,2)
  silkscreen extent -4.95,-2.35 2.45,3.4, body extent -4.96,-2.34 2.44,3.41, height 7.05
B4BXHALFSN [mm]
  round 1.5 hole 1: 1(0,0) 2(2.5,0) 3(5,0) 4(7.5,0)
  silkscreen extent -2.45,-2.35 9.95,3.4, body extent -2.54,-2.37 9.86,3.38, height 7
BEADC2012X110N [mm]
  rrect25% 1.15x1.4 smd: 1(-0.9,0) 2(0.9,0)
  silkscreen extent 0,-0.5 0,0.5, body extent -1,-0.6 1,0.6, height 1.1
C0402 [mm]
  rect 0.54x0.6 smd paste+0 mask+0.102: 1(-0.43,0) 2(0.43,0)
  silkscreen extent -0.9,-0.6 0.9,0.6, body extent -0.5,-0.25 0.5,0.25, height 0.55
C0603 [mm] "Chip Capacitor, 2-Leads, Body 1.60x0.80mm, IPC Medium Density"
  rect 0.7x0.7 smd: 1(-0.65,0) 2(0.65,0)
  silkscreen extent -1.3,-0.6 1.3,0.6, body extent -0.8,-0.4 0.8,0.4, height 0.7
C0805 [mm] "J2, Film Capacitor PPS , 2-Leads, Body 2.00x1.25mm, IPC Medium Density"
  rect 0.85x1.1 smd: 1(-0.925,0) 2(0.925,0)
  silkscreen extent -1.55,-0.82 1.55,0.82, body extent -1,-0.62 1,0.62, height 1.2
C1210 [mm]
  rect 1.1x2.05 smd: 1(-1.65,0) 2(1.65,0)
  silkscreen extent -2.8,-1.52 2.03,1.52, body extent -1.6,-1.25 1.6,1.25, height 1.25
CAPAE530X580N [mm]
  rect 2.9x1.8 smd: 1(-2,0) 2(2,0)
  silkscreen extent -3.45,-2.65 2.67,2.65, body extent -3,-2.65 3,2.65, height 5.65
ESP32S3WROOM1N16R8 [mm]
  rect 1.5x0.9 smd: 1(-8.75,5.26) 2(-8.75,3.99) 3(-8.75,2.72) 4(-8.75,1.45) 5(-8.75,0.18) 6(-8.75,-1.09) 7(-8.75,-2.36) 8(-8.75,-3.63) 9(-8.75,-4.9) 10(-8.75,-6.17) 11(-8.75,-7.44) 12(-8.75,-8.71) 13(-8.75,-9.98) 14(-8.75,-11.25) 27(8.75,-11.25) 28(8.75,-9.98) 29(8.75,-8.71) 30(8.75,-7.44) 31(8.75,-6.17) 32(8.75,-4.9) 33(8.75,-3.63) 34(8.75,-2.36) 35(8.75,-1.09) 36(8.75,0.18) 37(8.75,1.45) 38(8.75,2.72) 39(8.75,3.99) 40(8.75,5.26)
  rect 0.9x1.5 smd: 15(-6.985,-12.5) 16(-5.715,-12.5) 17(-4.445,-12.5) 18(-3.175,-12.5) 19(-1.905,-12.5) 20(-0.635,-12.5) 21(0.635,-12.5) 22(1.905,-12.5) 23(3.175,-12.5) 24(4.445,-12.5) 25(5.715,-12.5) 26(6.985,-12.5)
  rect 0.9x0.9 smd: 41(-1.5,-2.46) 42(-2.9,-1.06) 43(-2.9,-2.46) 44(-2.9,-3.86) 45(-1.5,-3.86) 46(-0.1,-3.86) 47(-0.1,-2.46) 48(-0.1,-1.06) 49(-1.5,-1.06)
  silkscreen extent -10,5.21 9,12.75, body extent -9,-12.75 9,12.75, height 3.25
FC135R327680KAA3 [mm]
  rect 1x1.8 smd: 1(-1.25,0) 2(1.25,0)
  silkscreen extent -0.4,-0.75 0.4,0.75, body extent -1.6,-0.75 1.6,0.75, height 0.9
GCT_MEM2067-02-180-00-A_REVB [mm]
  rect 0.8x1.2 smd: 1(3.225,-2.625) 2(2.125,-2.625) 3(1.025,-2.625) 4(-0.075,-2.625) 5(-1.175,-2.625) 6(-2.275,-2.625) 7(-3.375,-2.625) 8(-4.475,-2.625)
  rect 1.5x2 smd: 9(-6.945,-4.825) 10(-6.945,3.375) 11(6.945,3.375) 12(6.945,-4.825)
  Keep-Out Layer region: 4.206,2.347 -3.779,2.347 -3.779,5.144 4.206,5.144
  silkscreen extent -6.8,-7.22 6.8,7.22, body extent -7.3,-7.22 7.3,7.22, height 1.8
GCT_USB4215-03-A_REVA [mm]
  rrect25% 0.6x1.15 smd mask+0.05: A1_B12(-3.2,4.575) A4_B9(-2.4,4.575) B1_A12(3.2,4.575) B4_A9(2.4,4.575)
  rrect25% 0.3x1.15 smd mask+0.05: A5(-1.25,4.575) A6(-0.25,4.575) A7(0.25,4.575) A8(1.25,4.575) B5(1.75,4.575) B6(0.75,4.575) B7(-0.75,4.575) B8(-1.75,4.575)
  oval 1x1.8 hole 0.6 slot 1.4 at 90 deg: SH1(-4.32,4) SH2(4.32,4)
  oval 1x2.2 hole 0.6 slot 1.8 at 90 deg: SH3(-4.32,0) SH4(4.32,0)
  silkscreen extent -4.47,-2.1 4.47,5.8, body extent -4.44,-1.87 4.5,4.87, height 3.28
HDR-TH_3P-P2.54-V-M [mm]
  rect 1.7x1.7 hole 1.1: 1(0,0)
  round 1.7 hole 1.1: 2(2.54,0) 3(5.08,0)
  silkscreen extent -1.27,-1.25 6.35,1.25, body extent -1.47,-1.4 6.28,1.14, height 8.38
HDR-TH_6P-P2.54-V-M-R2-C3-S2.54-1 [mm]
  rect 1.8x1.8 hole 1.05: 1(0,0)
  round 1.8 hole 1.05: 2(0,2.54) 3(2.54,0) 4(2.54,2.54) 5(5.08,0) 6(5.08,2.54)
  silkscreen extent -1.27,-1.27 6.35,3.81, body extent -1.27,-1.14 6.35,3.68, height 8.18
PTS645SM43SMTR92LFS [mm]
  rect 1.55x1.3 smd: 1(-3.975,2.25) 2(3.975,2.25) 3(-3.975,-2.25) 4(3.975,-2.25)
  silkscreen extent -5.3,-3 3,3, body extent -4.5,-3 4.5,3, height 4.3
QFN40P1000X1000X90-81N-D [mm]
  rrect25% 0.85x0.2 smd mask+0.102: 1(-4.95,3.8) 2(-4.95,3.4) 3(-4.95,3) 4(-4.95,2.6) 5(-4.95,2.2) 6(-4.95,1.8) 7(-4.95,1.4) 8(-4.95,1) 9(-4.95,0.6) 10(-4.95,0.2) 11(-4.95,-0.2) 12(-4.95,-0.6) 13(-4.95,-1) 14(-4.95,-1.4) 15(-4.95,-1.8) 16(-4.95,-2.2) 17(-4.95,-2.6) 18(-4.95,-3) 19(-4.95,-3.4) 20(-4.95,-3.8) 41(4.95,-3.8) 42(4.95,-3.4) 43(4.95,-3) 44(4.95,-2.6) 45(4.95,-2.2) 46(4.95,-1.8) 47(4.95,-1.4) 48(4.95,-1) 49(4.95,-0.6) 50(4.95,-0.2) 51(4.95,0.2) 52(4.95,0.6) 53(4.95,1) 54(4.95,1.4) 55(4.95,1.8) 56(4.95,2.2) 57(4.95,2.6) 58(4.95,3) 59(4.95,3.4) 60(4.95,3.8)
  rrect25% 0.2x0.85 smd mask+0.102: 21(-3.8,-4.95) 22(-3.4,-4.95) 23(-3,-4.95) 24(-2.6,-4.95) 25(-2.2,-4.95) 26(-1.8,-4.95) 27(-1.4,-4.95) 28(-1,-4.95) 29(-0.6,-4.95) 30(-0.2,-4.95) 31(0.2,-4.95) 32(0.6,-4.95) 33(1,-4.95) 34(1.4,-4.95) 35(1.8,-4.95) 36(2.2,-4.95) 37(2.6,-4.95) 38(3,-4.95) 39(3.4,-4.95) 40(3.8,-4.95) 61(3.8,4.95) 62(3.4,4.95) 63(3,4.95) 64(2.6,4.95) 65(2.2,4.95) 66(1.8,4.95) 67(1.4,4.95) 68(1,4.95) 69(0.6,4.95) 70(0.2,4.95) 71(-0.2,4.95) 72(-0.6,4.95) 73(-1,4.95) 74(-1.4,4.95) 75(-1.8,4.95) 76(-2.2,4.95) 77(-2.6,4.95) 78(-3,4.95) 79(-3.4,4.95) 80(-3.8,4.95)
  rrect5% 3.45x3.45 smd paste-3.45 mask+0.102: 81(0,0)
  silkscreen extent -5.47,4.3 -5.28,4.5, body extent -5.05,-5.05 5.05,5.05, height 0.9
QFN50P300X300X100-17N-D [mm]
  rrect25% 0.8x0.3 smd mask+0.07: 1(-1.5,0.75) 2(-1.5,0.25) 3(-1.5,-0.25) 4(-1.5,-0.75) 9(1.5,-0.75) 10(1.5,-0.25) 11(1.5,0.25) 12(1.5,0.75)
  rrect25% 0.3x0.8 smd mask+0.07: 5(-0.75,-1.5) 6(-0.25,-1.5) 7(0.25,-1.5) 8(0.75,-1.5) 13(0.75,1.5) 14(0.25,1.5) 15(-0.25,1.5) 16(-0.75,1.5)
  rrect5% 1.75x1.75 smd paste-1.75 mask+0.07: 17(0,0)
  silkscreen extent -2.02,1.38 -1.78,1.62, body extent -1.5,-1.5 1.5,1.5, height 1
R0402_1005 [mm] "Chip Resistor, 2-Leads, Body 1.0x0.5mm, IPC Medium Density"
  rect 0.75x0.6 smd: 1(-0.575,0) 2(0.575,0)
  silkscreen extent -1.14,-0.51 1.14,0.51, body extent -0.5,-0.25 0.5,0.25, height 0.35
R0603_1608 [mm] "Chip Resistor, 2-Leads, Body 1.60x0.80mm, IPC Medium Density"
  rect 0.85x0.95 smd: 1(-0.65,0) 2(0.65,0)
  silkscreen extent -1.27,-0.7 1.27,0.7, body extent -0.8,-0.4 0.8,0.4, height 0.45
R0805_2012 [mm] "Chip Resistor, 2-Leads, Body 2.00x1.25mm, IPC Medium Density"
  rect 1.15x1.35 smd: 1(-0.875,0) 2(0.875,0)
  silkscreen extent -1.7,-0.9 1.7,0.9, body extent -1,-0.62 1,0.63, height 0.6
SHDR16W66P254_2X8_2792X905X905P [mm]
  rect 1.725x1.725 / inner round 1.725 / far side rect 1.725x1.725 hole 1.15: 1(0,0)
  round 1.725 hole 1.15: 2(0,2.54) 3(2.54,0) 4(2.54,2.54) 5(5.08,0) 6(5.08,2.54) 7(7.62,0) 8(7.62,2.54) 9(10.16,0) 10(10.16,2.54) 11(12.7,0) 12(12.7,2.54) 13(15.24,0) 14(15.24,2.54) 15(17.78,0) 16(17.78,2.54)
  silkscreen extent -5.08,-6.73 23.15,5.92, body extent -5.07,-3.25 22.85,5.79, height 9.05
SMA_STM#1 [mil]
  rect 87x67 smd paste+0 mask+0: 1(-76,0) 2(76,0)
  silkscreen extent -194,-62 96,62, body extent -106,-57 106,57, height 104
SMA_STM#2 [mil]
  rect 87x67 smd paste+0 mask+0: 1(-76,0) 2(76,0)
  L1(SIG) keep-out region: -19.94,-55.06 -19.94,54.94 20.07,54.94 20.07,-55.06
  Keep-Out Layer region: -19.94,-55 -19.94,55 20.07,55 20.07,-55
  silkscreen extent -194,-62 96,62, body extent -106,-57 106,57, height 104
SMA_STM#3 [mil]
  rect 87x67 smd paste+0 mask+0: 1(-76,0) 2(76,0)
  Keep-Out Layer region: -20.82,-55.07 -20.82,54.93 15.69,54.93 15.69,-55.07
  silkscreen extent -194,-62 96,62, body extent -106,-57 106,57, height 104
SODFL1608X65N [mm]
  rect 0.53x0.42 smd: 1(-0.8,0) 2(0.8,0)
  silkscreen extent -1.06,-0.4 0.6,0.4, body extent -0.8,-0.38 0.8,0.45, height 0.64
SODFL1608X70N [mm]
  rect 0.64x0.42 smd: 1(-0.75,0) 2(0.75,0)
  silkscreen extent -1.07,-0.4 0.6,0.4, body extent -0.79,-0.4 0.81,0.4, height 0.7
SOIC8_SWB_MCH [mm]
  rrect25% 1.391x0.6 smd paste+0 mask+0: 1(-2.651,1.905) 2(-2.651,0.635) 3(-2.651,-0.635) 4(-2.651,-1.905) 5(2.651,-1.905) 6(2.651,-0.635) 7(2.651,0.635) 8(2.651,1.905)
  silkscreen extent -2.08,-2.58 2.08,2.58, body extent -3,-2.45 3,2.45, height 1.76
SOIC127P600X175-8N [mm]
  rrect25% 1.5x0.65 smd: 1(-2.7,1.905) 2(-2.7,0.635) 3(-2.7,-0.635) 4(-2.7,-1.905) 5(2.7,-1.905) 6(2.7,-0.635) 7(2.7,0.635) 8(2.7,1.905)
  silkscreen extent -3.45,-2.45 1.6,2.58, body extent -2.98,-2.5 3.02,2.4, height 1.75
SOIC127P790X216-8N [mm]
  rrect25% 1.61x0.58 smd: 1(-3.605,1.905) 2(-3.605,0.635) 3(-3.605,-0.635) 4(-3.605,-1.905) 5(3.605,-1.905) 6(3.605,-0.635) 7(3.605,0.635) 8(3.605,1.905)
  silkscreen extent -5.31,-2.64 2.64,2.64, body extent -3.95,-2.64 3.95,2.64, height 2.16
SOP65P640X120-20N [mm]
  rrect25% 1.475x0.45 smd mask+0.07: 1(-2.938,2.925) 2(-2.938,2.275) 3(-2.938,1.625) 4(-2.938,0.975) 5(-2.938,0.325) 6(-2.938,-0.325) 7(-2.938,-0.975) 8(-2.938,-1.625) 9(-2.938,-2.275) 10(-2.938,-2.925) 11(2.938,-2.925) 12(2.938,-2.275) 13(2.938,-1.625) 14(2.938,-0.975) 15(2.938,-0.325) 16(2.938,0.325) 17(2.938,0.975) 18(2.938,1.625) 19(2.938,2.275) 20(2.938,2.925)
  silkscreen extent -3.67,-3.25 1.85,3.5, body extent -3.2,-3.25 3.2,3.25, height 1.13
SOT65P490X110-8N [mm]
  rrect25% 1.3x0.45 smd mask+0.07: 1(-2.25,0.975) 2(-2.25,0.325) 3(-2.25,-0.325) 4(-2.25,-0.975) 5(2.25,-0.975) 6(2.25,-0.325) 7(2.25,0.325) 8(2.25,0.975)
  silkscreen extent -2.9,-1.5 1.25,1.55, body extent -2.45,-1.5 2.45,1.5, height 1.1
SRP4020FA2R2M [mm]
  rrect25% 3.8x1 smd: 1(0,1.2) 2(0,-1.2)
  silkscreen extent -2.05,-2.05 2.05,2.6, body extent -2.05,-2.05 2.05,2.05, height 1.96
"Test point SDT8" [mm]
  round 1.2 hole 0.8: 1(0.01,-0.006)
  silkscreen extent -0.85,-0.78 0.92,0.77
XTAL_ABM8-272-T3 [mm]
  rect 1.05x1.3 smd: 1(-0.875,1.15) 2(-0.875,-1.15) 3(0.875,-1.15) 4(0.875,1.15)
  silkscreen extent -1.39,-0.09 1.25,2.68, body extent -1.25,-1.6 1.25,1.6, height 0.7
YC124FR0733RL [mm]
  rrect25% 0.3x0.65 smd mask+0.07: 1(-0.75,-0.575) 2(-0.25,-0.575) 3(0.25,-0.575) 4(0.75,-0.575) 5(-0.75,0.575) 6(-0.25,0.575) 7(0.25,0.575) 8(0.75,0.575)
  silkscreen extent -0.8,-1.5 -0.7,-1.4, body extent -1,-0.5 1,0.5, height 0.55
YK6010223000G [mm]
  rect 3x3 hole 2: 1(0,0)
  round 3 hole 2: 2(10,0)
  silkscreen extent -7.3,-8.7 16.75,8.7, body extent -6.8,-8.59 16.7,8.76, height 19.7

## Part data
BAT201: "Coin Cell Battery Holders S/M Coin cell hldr for 1220 batteries", Manufacturer_Name="Keystone Electronics", Mouser Part Number=534-1056, Datasheet Link=https://www.keyelco.com/product.cfm/product_id/715, Geometry.Height=4.24mm, Manufacturer_Part_Number=1056, Mouser Price/Stock=https://www.mouser.co.uk/ProductDetail/Keystone-Electronics/1056?qs=sZfk%252BfAlGe4w00bCJntjFg%3D%3D
C1 C2 C3 C4: "WCAP-PSLP Aluminum Polymer Capacitors PSEC058220M016DVCTBB000; SMT V-Chip; 22 F +/- 20%; 16 V(DC); 2000 h; -55C / +105C; size DxL 5.0 x 5.8; ESR 30 m; Max. Iripple 2200 mA @100 kHz; LC 400 A; DF 8 %", Manufacturer_Name="Wurth Elektronik", Mouser Part Number=710-875105359003, Voltage=16V, Datasheet Link=https://www.we-online.com/catalog/datasheet/875105359003.pdf, Geometry.Height=5.8mm, Manufacturer_Part_Number=875105359003, Mouser Price/Stock=https://www.mouser.co.uk/ProductDetail/Wurth-Elektronik/875105359003?qs=0KOYDY2FL29jQO14iscAeA%3D%3D
C5 C6 C106 C108 C109 C110 C111 C125 C204 C206 C300 C302 C304 C306 C308 C310: library part CAP_0603_16V, "SMD Capacitor", Dielectric=?, Package=0603, Temperature Coefficient=X7R, Tolerance=10%, Voltage=16V, Excepted=?, Manufacturer Reference=?, Power=?
C7 C103 C104 C105 C107 C113 C114 C115 C116 C117 C118 C119 C120 C121 C122 C123 C124 C126 C127 C201 C202 C203 C205 C207 C210 C301 C303 C305 C307 C309 C311: library part CAP_0603_16V, "SMD Capacitor", Dielectric=?, Package=0603, Voltage=16V, Excepted=?, Manufacturer Reference=?, Power=?, Tolerance=?
C8 C101 C102: library part CAP_0805_16V, "SMD Capacitor", Dielectric=?, Package=0805, Voltage=16V, Excepted=?, Manufacturer Reference=?, Power=?, Tolerance=?
C9: library part CAP_1210_25V, "SMD Capacitor", Dielectric=?, Package=1210, Voltage=25V, Excepted=?, Manufacturer Reference=?, Power=?, Tolerance=?
C10: library part CAP_0603_25V, "SMD Capacitor", Dielectric=?, Package=0603, Voltage=25V, Excepted=?, Manufacturer Reference=?, Power=?, Tolerance=?
C112: library part CAP_0402_16V, "SMD Capacitor", Dielectric=?, Package=0603, Voltage=16V, Excepted=?, Manufacturer Reference=?, Power=?, Tolerance=?
C208 C209: library part CAP_0603_16V, "SMD Capacitor", Dielectric=?, Package=0603, Voltage=50V, Excepted=?, Manufacturer Reference=?, Power=?, Tolerance=?
D1 D101 D205 D206: "30 V, 2 A Low Drop Power Schottky Rectifier", Manufacturer_Name=STMicroelectronics, Copyright="Copyright (C) 2025 Ultra Librarian. All rights reserved.", Manufacturer_Part_Number=STPS2L30A
D2 D102 D103 D104 D203 D204: "PESD5V0S1BB - Bidirectional ESD protection diode", Arrow Part Number=PESD5V0S1BB,115, Manufacturer_Name=Nexperia, Mouser Part Number=771-PESD5V0S1BB-T/R, Arrow Price/Stock=https://www.arrow.com/en/products/pesd5v0s1bb115/nexperia?region=nac, Datasheet Link=https://assets.nexperia.com/documents/data-sheet/PESD5V0S1BB.pdf, Geometry.Height=0.65mm, Manufacturer_Part_Number=PESD5V0S1BB,115, Mouser Price/Stock=https://www.mouser.co.uk/ProductDetail/Nexperia/PESD5V0S1BB115?qs=LOCUfHb8d9vW06zz0pOppQ%3D%3D
D201 D202: "Extremely Fast Switching Speed; Extremely Low Forward Voltage: 0.28 V (Typ) @ IF = 1.0 mAdc; Low Reverse Current; LeadFree Plating; These Devices are PbFree, Halogen Free/BFR Free and are RoHS Compliant", Manufacturer_Name=onsemi, Mouser Part Number=863-RB751S40T1G, Arrow Part Number=RB751S40T1G, Arrow Price/Stock=https://www.arrow.com/en/products/rb751s40t1g/on-semiconductor.html?utm_currency=USD&region=asia, Datasheet Link=https://www.onsemi.com/pub/Collateral/RB751S40T1-D.PDF, Geometry.Height=0.7mm, Manufacturer_Part_Number=RB751S40T1G, Mouser Price/Stock=https://www.mouser.co.uk/ProductDetail/onsemi/RB751S40T1G?qs=xZq1yRCsb1eQ%2Ff4mzLQKzQ%3D%3D
FB1: "BOURNS - MH2029-601Y - FERRITE, BEAD, 0805, 0.2OHM, 1A", Manufacturer_Name=Bourns, Mouser Part Number=652-MH2029-601Y, Arrow Part Number=MH2029-601Y, Arrow Price/Stock=https://www.arrow.com/en/products/mh2029-601y/bourns?utm_currency=USD&region=europe, Datasheet Link=http://www.bourns.com/docs/Product-Datasheets/mh.pdf, Geometry.Height=1.1mm, Manufacturer_Part_Number=MH2029-601Y, Mouser Price/Stock=https://www.mouser.co.uk/ProductDetail/Bourns/MH2029-601Y?qs=aqFbwuCjQomuno9nfXC5VQ%3D%3D
J1: "2 Circuit 0.394\" (10.00mm) Barrier Block Connector Screws with Captive Plate 20A  300V PC Pin Through Hole -40C ~ 115C", Manufacturer_Name=Amphenol, Mouser Part Number=649-YK60102230J0G, Datasheet Link=https://www.anytek.com.tw/Upload/8YK0006601%E5%B7%B2%E8%9E%8D%E5%90%88-16535753519.pdf, Geometry.Height=20mm, Manufacturer_Part_Number=YK6010223000G, Mouser Price/Stock=https://www.mouser.co.uk/ProductDetail/Amphenol-Anytek/YK6010223000G?qs=Mv7BduZupUhsrUKvI0zJrA%3D%3D
J101 J201: "USB-C (USB TYPE-C) USB 2.0 Receptacle Connector 24 (16+8 Dummy) Position Surface Mount, Right Angle; Through Hole", Package=None, Check_prices=https://www.snapeda.com/parts/USB4215-03-A/Global+Connector+Technology/view-part/?ref=eda, MF="Global Connector Technology", MP=USB4215-03-A, SnapEDA_Link=https://www.snapeda.com/parts/USB4215-03-A/Global+Connector+Technology/view-part/?ref=snap
J102: "Micro SD Memory Card ConnectorSMT, Hinged, 1.80mm Profile", Package=None, Availability=Unavailable, MP=MEM2067-02-180-00-A_REVB, Price=None
J103 J104 J203: Color=Black, Current Rating=3A, Dielectric=?, JLCPCB Part Class="Extended Part", LCSC Part Name="1x3P 间距:2.54mm 方针 直插", Manufacturer=CONNFLY, Operating Temperature=-40℃~+105℃, Voltage Rating (Max)=250V, Add into BOM=yes, Circluar Pins/Square Pins="Pin Header", Contact Material="Copper Alloy", Contact Plating=Gold, Convert to PCB=yes, Datasheet=https://item.szlcsc.com/datasheet/DS1021-1x3SF11-B/8430012.html, Device=DS1021-1x3SF11-B, Excepted=?, Manufacturer Part=DS1021-1x3SF11-B, Mounting Type="Through Hole", Number of Pins=3P, Number of Rows=1, Package=?, Pin Structure=1x3P, Pitch=2.54mm, Power=?, Supplier=LCSC, Supplier Footprint=插件,P=2.54mm, Supplier Part=C7430359, Symbol=DS1021-1X3SF11-B, Tolerance=?, Voltage=?
J202: "CONN HEADER VERT 4POS 2.5MM", Arrow Part Number=B4B-XH-A(LF)(SN), Manufacturer_Name="JST (JAPAN SOLDERLESS TERMINALS)", Mouser Part Number=306-B4BXHALFSN, Arrow Price/Stock=https://www.arrow.com/en/products/b4b-xh-a-lf-sn/jst-manufacturing.html?utm_currency=USD&region=europe, Datasheet Link=https://datasheet.lcsc.com/szlcsc/JST-Sales-America-B4B-XH-A-LF-SN_C144395.pdf, Geometry.Height=7mm, Manufacturer_Part_Number=B4B-XH-A(LF)(SN), Mouser Price/Stock=https://www.mouser.co.uk/ProductDetail/JST-Commercial/B4B-XH-ALFSN?qs=cdbOS8ANM9CfC08d%252BywhFw%3D%3D
J204 J205 J206: "CONN HEADER VERT 2POS 2.5MM", Arrow Part Number=B2B-XH-AM(LF)(SN), Manufacturer_Name="JST (JAPAN SOLDERLESS TERMINALS)", Mouser Part Number=306-B2B-XH-AMLFSNP, Arrow Price/Stock=https://www.arrow.com/en/products/b2b-xh-am-lf-sn/jst-manufacturing.html?utm_currency=USD&region=europe, Datasheet Link=https://www.jst-mfg.com/product/pdf/eng/eXH.pdf, Geometry.Height=7mm, Manufacturer_Part_Number=B2B-XH-AM(LF)(SN), Mouser Price/Stock=https://www.mouser.co.uk/ProductDetail/JST-Commercial/B2B-XH-AMLFSN?qs=cdbOS8ANM9BJgHgwB7WxQw%3D%3D
J300 J301: Color=Black, Current Rating=3A, Dielectric=?, JLCPCB Part Class="Extended Part", LCSC Part Name="2x3P 间距:2.54mm 方针 直插", Manufacturer=Megastar(兆星), Operating Temperature=-40℃~+105℃, Voltage Rating (Max)=1kV, Add into BOM=yes, Circluar Pins/Square Pins="Pin Header", Contact Material=Brass, Contact Plating=Gold, Convert to PCB=yes, Datasheet=https://item.szlcsc.com/datasheet/ZX-PZ2.54-2-3PZZ/8582487.html, Device=ZX-PZ2.54-2-3PZZ, Excepted=?, Insulation Height=2.5mm, Length of End Connection Pin=3mm, Length of Mating Pin=6mm, Manufacturer Part=ZX-PZ2.54-2-3PZZ, Mounting Type="Through Hole", Number of Pins=6P, Number of Rows=2, Package=?, Pin Structure=2x3P, Pitch=2.54mm, Power=?, Row Spacing=2.54mm, Supplier=LCSC, Supplier Footprint=插件,P=2.54mm, Supplier Part=C7501274, Symbol=ZX-PZ2.54-2-3PZZ, Tolerance=?, Voltage=?
L1: "Fixed Inductors 2.2uH 20% 8A", Manufacturer_Name=Bourns, Mouser Part Number=652-SRP4020FA-2R2M, Arrow Part Number=SRP4020FA-2R2M, Arrow Price/Stock=https://www.arrow.com/en/products/srp4020fa-2r2m/bourns.html?utm_currency=USD&region=nac, Datasheet Link=https://www.bourns.com/docs/Product-Datasheets/SRP4020FA.pdf, Geometry.Height=2.1mm, Manufacturer_Part_Number=SRP4020FA-2R2M, Mouser Price/Stock=https://www.mouser.co.uk/ProductDetail/Bourns/SRP4020FA-2R2M?qs=MLItCLRbWswKB3debRJXpA%3D%3D
L101: "3.3 µH Shielded Molded Inductor 2.1 A 140mOhm Max 0806 (2016 Metric)", Manufacturer_Name=ABRACON, Mouser Part Number=815-AB201610S3R3101T, Arrow Part Number=AOTA-B201610S3R3-101-T, Arrow Price/Stock=https://www.arrow.com/en/products/aota-b201610s3r3-101-t/abracon.html?utm_currency=USD&region=nac, Datasheet Link=https://abracon.com/datasheets/AOTA-B201610S3R3-101-T.pdf, Geometry.Height=1mm, Manufacturer_Part_Number=AOTA-B201610S3R3-101-T, Mouser Price/Stock=https://www.mouser.co.uk/ProductDetail/ABRACON/AOTA-B201610S3R3-101-T?qs=%252BXxaIXUDbq0IZvJW%2F2mv4w%3D%3D
P0 P1 P2 P3: "2.54mm Dual Row, Vertical Box Header", Manufacturer_Name="On Shore Technology Inc.", Arrow Part Number=302-S161, Arrow Price/Stock=null?region=nac, Datasheet Link=http://www.on-shore.com/wp-content/uploads/2018/04/302-SXX1.pdf, Geometry.Height=9.05mm, Manufacturer_Part_Number=302-S161
Q201: "Mosfet Canal N, RDS(ON) = 30 m @ VGS = 4.5 V; Low gate charge; RDS(ON) = 43 m @ VGS = 2.5 V; Optimized for use in battery protection circuits; +/-10 VGSS allows for wide operating voltage range; 6.5 A, 20 V", Arrow Part Number=FDS9926A, Manufacturer_Name=onsemi, Mouser Part Number=512-FDS9926A, Arrow Price/Stock=https://www.arrow.com/en/products/fds9926a/on-semiconductor?utm_currency=USD&region=nac, Datasheet Link=https://www.onsemi.com/pub/Collateral/FDS9926A-D.PDF, Geometry.Height=1.75mm, Manufacturer_Part_Number=FDS9926A, Mouser Price/Stock=https://www.mouser.co.uk/ProductDetail/onsemi-Fairchild/FDS9926A?qs=HK%252BeIG1iaagpgrEVRWCDdA%3D%3D
R1: library part Resistor, "SMD Resistor", Dielectric=?, Package=0805, Power=1/16W, Tolerence=10%, Excepted=?, Manufacturer Reference=?, Voltage=?
R2 R101 R102 R104 R107 R108 R111 R112 R113 R114 R115 R116 R117 R118 R119 R201 R202 R203 R204 R205 R206 R207 R208 R209 R210 R211 R212 R213 R214 R300 R309: library part Resistor, "SMD Resistor", Dielectric=?, Package=0603, Power=1/16W, Tolerence=1%, Excepted=?, Manufacturer Reference=?, Voltage=?
R3 R103: library part Resistor, "SMD Resistor", Dielectric=?, Package=0805, Power=1/16W, Tolerence=1%, Excepted=?, Manufacturer Reference=?, Voltage=?
R105 R106: library part Resistor, "SMD Resistor", Dielectric=?, Package=0402, Power=1/16W, Tolerence=1%, Excepted=?, Manufacturer Reference=?
R109: library part Resistor, "SMD Resistor", Dielectric=?, Package=0402, Power=1/20W, Tolerence=1%, Excepted=?, Manufacturer Reference=?, Voltage=?
R110: library part Resistor, "SMD Resistor", Dielectric=?, Package=0603, Power=1/20W, Tolerence=1%, Excepted=?, Manufacturer Reference=?, Voltage=?
R301 R302 R303 R304 R305 R306 R307 R308 R310 R311 R312 R313: "33 Ohm +/-1% 62.5mW Power Per Element Isolated 4 Resistor Network/Array +/-200ppm/C 0804, Convex, Long Side Terminals", Manufacturer_Name="Yageo Group", Mouser Part Number=603-YC124-FR-0733RL, Arrow Part Number=YC124-FR-0733RL, Arrow Price/Stock=https://www.arrow.com/en/products/yc124-fr-0733rl/yageo.html?utm_currency=USD&region=nac, Datasheet Link=https://yageogroup.com/content/datasheet/asset/file/PYU-YC_TC_GROUP_51_ROHS_L, Geometry.Height=0.55mm, Manufacturer_Part_Number=YC124-FR-0733RL, Mouser Price/Stock=https://www.mouser.co.uk/ProductDetail/YAGEO/YC124-FR-0733RL?qs=Omyi%252BwOkBJUSdM%252BPj18Bfg%3D%3D
SW101 SW102 SW201 SW202: "Tactile Switch, PTS645 Series, Top Actuated, Surface Mount, Round Button, 160 gf, 50mA at 12VDC", Arrow Part Number="PTS645SM43SMTR92 LFS", Manufacturer_Name=LITTELFUSE, Mouser Part Number=611-PTS645SM43SMTR92, Arrow Price/Stock=https://www.arrow.com/en/products/pts645sm43smtr92lfs/ck?utm_currency=USD&region=nac, Datasheet Link=https://www.ckswitches.com/media/1471/pts645.pdf, Height=4.4mm, Manufacturer_Part_Number="PTS645SM43SMTR92 LFS", Mouser Price/Stock=https://www.mouser.co.uk/ProductDetail/CK/PTS645SM43SMTR92-LFS?qs=Imq1NPwxi75hrUk5xRQGSg%3D%3D
TP1 TP2 TP3 TP4 TP5: library part "TEST_P SDT8", Dielectric=?, Excepted=?, Package=?, Power=?, Tolerance=?, Voltage=?
U1: "TEXAS INSTRUMENTS - TPS62142RGTR - DC/DC CONV, SYNC BUCK, 2.5MHZ, VQFN-16, Switch step down converter", Manufacturer_Name="Texas Instruments", Mouser Part Number=595-TPS62142RGTR, Arrow Part Number=TPS62142RGTR, Arrow Price/Stock=https://www.arrow.com/en/products/tps62142rgtr/texas-instruments?region=nac, Datasheet Link=http://www.ti.com/lit/ds/symlink/tps62140.pdf, Geometry.Height=1mm, Manufacturer_Part_Number=TPS62142RGTR, Mouser Price/Stock=https://www.mouser.co.uk/ProductDetail/Texas-Instruments/TPS62142RGTR?qs=gXEV9p%2FxLgdJ2ViLpYqiRw%3D%3D
U100: "Dual Arm Cortex-M33 or dual Hazard3 RISC-V processors @ 150MHz", Manufacturer_Name=RASPBERRY-PI, Datasheet Link=https://datasheets.raspberrypi.com/rp2350/rp2350-product-brief.pdf, Geometry.Height=0.9mm, Manufacturer_Part_Number=RP2350B
U101: "DRAM IoT RAM 64Mb QSPI (x1,x4) SDR 133/84MHz, RBX, 3V, Ind. Temp., SOP8", Manufacturer_Name="AP Memory", Mouser Part Number=878-APS6404L-3SQR-SN, Datasheet Link=https://eu.mouser.com/datasheet/2/1127/APM_PSRAM_QSPI_APS6404L_3SQR_v2_3_PKG-1954826.pdf, Geometry.Height=1.75mm, Manufacturer_Part_Number=APS6404L-3SQR-SN, Mouser Price/Stock=https://www.mouser.co.uk/ProductDetail/AP-Memory/APS6404L-3SQR-SN?qs=IS%252B4QmGtzzqsn3S5xo%2FEEg%3D%3D
U102: "FLASH - NOR Memory IC 128Mb (16M x 8) SPI - Quad I/O, QPI, DTR 133 MHz 8-SOIC", Package="SOIC-8 Winbond Electronics", Check_prices=https://www.snapeda.com/parts/W25Q128JVSIQ/Winbond/view-part/?ref=eda, MF="Winbond Electronics", MP=W25Q128JVSIQ, SnapEDA_Link=https://www.snapeda.com/parts/W25Q128JVSIQ/Winbond/view-part/?ref=snap
U200: "Esspressif Multiprotocol Modules SMD Module, ESP32-S3R8, 3.3V, 8 MB Octal PSRAM Die, 16 MB Quad SPI Flash, PCB Antenna", Manufacturer_Name="Espressif Systems", Mouser Part Number=356-ESP32S3WRM1N16R8, Datasheet Link=https://www.espressif.com/sites/default/files/documentation/esp32-s3-wroom-1_wroom-1u_datasheet_en.pdf, Geometry.Height=3.25mm, Manufacturer_Part_Number=ESP32-S3-WROOM-1-N16R8, Mouser Price/Stock=https://www.mouser.co.uk/ProductDetail/Espressif-Systems/ESP32-S3-WROOM-1-N16R8?qs=Li%252BoUPsLEnvQc9gW6AMhZg%3D%3D
U201: "NXP - PCF8563TS/5,118 - REAL TIME CLOCK(RTC), 5.5V, I2C, TSSOP-8", Arrow Part Number=PCF8563TS/5,118, Manufacturer_Name=NXP, Mouser Part Number=771-PCF8563TS/5118, Arrow Price/Stock=https://www.arrow.com/en/products/pcf8563ts5118/nxp-semiconductors.html?utm_currency=USD&region=nac, Datasheet Link=http://www.nxp.com/docs/en/data-sheet/PCF8563.pdf, Geometry.Height=1.1mm, Manufacturer_Part_Number=PCF8563TS/5,118, Mouser Price/Stock=https://www.mouser.co.uk/ProductDetail/NXP-Semiconductors/PCF8563TS-5118?qs=beN0Cyoe8Ynnzly4fQaDyw%3D%3D
U202: "Security ICs / Authentication ICs ECC/ECDH, I2C, SOIC T/R", Manufacturer_Name=Microchip, Copyright="Copyright (C) 2025 Ultra Librarian. All rights reserved.", Manufacturer_Part_Number=ATECC608C-SSHDA-T, RefDes=RefDes, Type=Type
U203: "EEPROM 256K (32K X 8), 2-WI 1.8V, SOIC", Manufacturer_Name=Microchip, Mouser Part Number=556-AT24C256C-SSHL-T, Arrow Part Number=AT24C256C-SSHL-T, Arrow Price/Stock=https://www.arrow.com/en/products/at24c256c-sshl-t/microchip-technology?utm_currency=USD&region=nac, Datasheet Link=http://www.atmel.com/Images/Atmel-8568-SEEPROM-AT24C256C-Datasheet.pdf, Geometry.Height=1.75mm, Manufacturer_Part_Number=AT24C256C-SSHL-T, Mouser Price/Stock=https://www.mouser.co.uk/ProductDetail/Microchip-Technology/AT24C256C-SSHL-T?qs=fzsaQExJLyR3ptk4tHE3tA%3D%3D
U300 U301 U302 U303 U304 U305: "Octal Buffers/Drivers With 3-State Outputs", Manufacturer_Name="Texas Instruments", Mouser Part Number=595-SN74AHCT541PWR, Arrow Part Number=SN74AHCT541PWR, Arrow Price/Stock=https://www.arrow.com/en/products/sn74ahct541pwr/texas-instruments.html?utm_currency=USD&region=nac, Datasheet Link=http://www.ti.com/lit/gpn/sn74ahct541, Geometry.Height=1.2mm, Manufacturer_Part_Number=SN74AHCT541PWR, Mouser Price/Stock=https://www.mouser.co.uk/ProductDetail/Texas-Instruments/SN74AHCT541PWR?qs=L4Mc90zKIphKuQtt%252Bo5snQ%3D%3D
Y101: "12 MHz Â±30ppm Crystal 10pF 50 Ohms 4-SMD, No Lead", Package="NON-STANDARD-4 Abracon", Check_prices=https://www.snapeda.com/parts/ABM8-272-T3/Abracon/view-part/?ref=eda, MF=ABRACON, MP=ABM8-272-T3, SnapEDA_Link=https://www.snapeda.com/parts/ABM8-272-T3/Abracon/view-part/?ref=snap
Y201: "Crystal or Oscillator, 32.768 kHz ±20ppm Crystal 12.5pF 50 kOhms 2-SMD, No Lead", Arrow Part Number="FC-135R 32.7680KA-A3", Load Capacitance=12.5pF, Manufacturer_Name="Epson Timing", Mouser Part Number=732-5R32.7680KA-A3, Arrow Price/Stock=https://www.arrow.com/en/products/fc-135r32.7680ka-a3/epson-electronics-america?region=nac, Datasheet Link=https://eu.mouser.com/datasheet/2/137/FC_255_en-1649561.pdf, ESR=50K, Height=0.9mm, Manufacturer_Part_Number="FC-135R 32.7680KA-A3", Mouser Price/Stock=https://www.mouser.co.uk/ProductDetail/Epson-Timing/FC-135R-32.7680KA-A3?qs=f9yNj16SXrIR19rZDPQCyw%3D%3D, Parameter 1=±20ppm

## Free pads (board coordinates)
  round 3.2 hole 3.2 unplated: MH(17.812,3.987) MH(46.338,125.848) MH(138.906,5.502) MH(139.035,122.188)

## Via types
v1: diameter 0.55, hole 0.3, L1(SIG) to L4(SIG), 508 vias
v2: diameter 0.8, hole 0.4, L1(SIG) to L4(SIG), 383 vias
v3: diameter 0.6, hole 0.3, L1(SIG) to L4(SIG), 111 vias
v4: diameter 0.6, hole 0.25, L1(SIG) to L4(SIG), 1 vias

## Nets (pads, with @x,y where several pads share a name; then routed paths per layer and width w, separated by ;. In a path a pad name is that pad's centre, name@x,y a point inside that pad or via, vN(x,y) a via of type N, cw(c..) or ccw(c..) an arc to the next point about the centre after c; other vN are vias at no path point)
3V3_EN: R1.2 R3.1 U1.13 | length 12.2
  L1(SIG) w0.3: R1.2@46.882,113.786 46.869,113.798 R3.1@46.869,116.128 47.021,116.28 v3(48.413,116.28) ; v3(49.268,109.715) 49.35,109.715 49.529,109.894 U1.13@50.425,109.894
  L4(SIG) w0.3: v3(48.413,116.28) 48.355,116.223 48.355,110.628 v3(49.268,109.715)
+1V1: C108.2 C113.2 C114.2 C115.2 L101.1 U100.10 U100.32 U100.51 U100.65 | length 58.6
  L1(SIG) w0.2: 64.772,56.817 64.844,56.817 64.878,56.782 U100.10@67.092,56.782 ; U100.32@72.642,51.632 72.642,50.214 72.888,49.968 ; U100.65@74.242,61.532 74.242,64.345 75.282,65.385 C108.2@76.05,65.385 ; U100.51@76.992,56.782 77.548,56.782 77.898,57.132 78.019,57.132
  L1(SIG) w0.3: 64.632,56.956 64.772,56.817 ; 78.019,57.132 79.519,57.132 79.731,57.344
  L1(SIG) w0.4: v1(64.215,56.962) 64.221,56.956 64.632,56.956 ; 72.888,49.968 73.29,49.566 v1(73.29,49.52) ; v1(73.719,59.146) 74.755,60.182 v1(74.755,60.284) ; v1(74.438,56.195) 75.57,56.195 75.85,56.475 v1(75.85,56.615) ; v1(75.914,66.596) 75.952,66.558 75.952,65.483 C108.2@76.05,65.385
  L1(SIG) w0.5: C115.2@62.788,56.837 64.063,56.837 64.188,56.962 v1(64.215,56.962) ; v1(73.29,49.52) 73.29,49.512 73.635,49.167 C114.2@73.635,48.067 ; v1(74.922,67.45) 74.929,67.457 75.765,67.457 76.015,67.707 L101.1@76.015,68.007 ; 79.731,57.344 80.162,57.775 80.162,57.806 v1(80.181,57.806) 80.208,57.806 80.314,57.912 81.311,57.912 C113.2@81.411,58.012
  L4(SIG) w0.4: v1(64.215,56.962) 65.898,56.962 68.872,59.936 72.979,59.936 74.444,58.471 74.444,54.204 73.117,52.877 73.07,52.877 72.678,52.486 72.678,50.181 73.29,49.57 v1(73.29,49.52) ; v1(74.755,60.284) 74.719,60.32 74.719,60.72 74.081,61.358 74.081,64.763 v1(75.914,66.596)
  L4(SIG) w0.5: v1(75.85,56.615) 77.041,57.806 v1(80.181,57.806)
+3V3: C8.2 C104.2 C106.2 C107.2 C109.2 C111.2 C112.2 C116.2 C117.2 C118.2 C119.2 C120.2 C121.2 C122.2 C123.2 C201.2 C204.2 C205.2 C210.2 D201.2 J102.4 J202.1 J204.2 L1.2 R2.2 R102.2 R104.1 R109.2 R110.2 R114.1 R115.1 R116.1 R117.1 R118.1 R119.1 R203.1 R204.1 R205.1 R206.1 R207.1 R208.1 R211.1 TP5.1 U1.14 U100.5 U100.15 U100.24 U100.29 U100.41 U100.50 U100.60 U100.64 U100.68 U100.69 U100.76 U101.8 U102.8 U200.2 U202.8 U203.8 | length 428.1
  L1(SIG) w0.2: 65.362,54.492 65.652,54.782 U100.15@67.092,54.782 ; 65.823,58.909 65.807,58.894 65.919,58.782 U100.5@67.092,58.782 ; U100.24@69.442,51.632 69.442,50.93 69.591,50.782 ; v1(69.599,63.222) 69.676,63.145 69.676,62.814 69.842,62.648 U100.76@69.842,61.532 ; 71.2,50.778 71.442,51.02 U100.29@71.442,51.632 ; U100.69@72.642,61.532 v1@72.642,62.682 ; v1@72.83,62.844 73.042,62.632 U100.68@73.042,61.532 ; U100.64@74.642,61.532 74.642,62.654 74.884,62.896 ; U100.41@76.992,52.782 77.317,52.782 77.713,52.386 ; U100.50@76.992,56.382 77.784,56.382 ; U100.60@76.992,60.382 77.317,60.382 77.317,60.416 77.558,60.657
  L1(SIG) w0.25: v1(50.101,108.867) 50.158,108.925 50.692,108.925 50.925,109.157 U1.14@50.925,109.894
  L1(SIG) w0.3: R2.2@56.465,115.288 56.465,113.977 56.731,113.711 v1(56.731,113.643) ; 77.558,60.657 v1(77.829,60.928) ; 77.784,56.382 78.304,56.382 v1(78.35,56.335) ; v1(134.028,54.843) 134.028,54.775 134.393,54.41 R208.1@134.393,48.376 R208.1@134.391,48.374 ; v1(134.028,56.129) 133.972,56.073 133.972,55.164 v1@134.161,54.975
  L1(SIG) w0.4: R102.2@53.042,80.286 53.092,80.286 53.317,80.511 53.317,80.851 v1(54.155,81.688) ; v1(56.709,106.192) 61.542,101.359 R104.1@61.542,90.76 ; v1(64.895,59.805) 64.896,59.805 65.807,58.894 ; v1(64.984,54.168) 65.038,54.168 65.362,54.492 ; v1(69.587,50.472) 69.583,50.476 69.591,50.484 69.591,50.782 ; v1@71.2,50.396 71.2,50.778 ; 74.884,62.899 v1(74.884,63.663) ; 77.713,52.386 v1(78.159,51.94) ; v1(84.446,33.624) 84.466,33.604 84.466,31.475 R119.1@84.486,31.455 ; R118.1@87.97,31.481 87.979,31.49 87.979,33.616 v1(87.988,33.624) ; v1(91.28,33.707) 91.289,33.698 91.289,31.49 R117.1@91.299,31.481 ; R116.1@94.636,31.442 94.652,31.458 94.652,33.663 v1(94.668,33.679) ; v1(98.141,33.624) 98.144,33.622 98.144,31.351 R115.1@98.146,31.348 ; v1(101.572,33.679) 101.578,33.674 101.578,31.344 R114.1@101.583,31.338 ; 110.903,79.393 110.94,79.356 111.656,79.356 D201.2@111.666,79.346
  L1(SIG) w0.5: U101.8@61.842,78.787 61.917,78.862 63.114,78.862 63.258,79.007 v1(63.285,79.007) 63.312,79.007 63.538,79.232 C104.2@64.642,79.232 ; C121.2@63.603,59.883 64.79,59.883 64.868,59.805 v1(64.895,59.805) ; C123.2@63.626,53.913 64.702,53.913 64.957,54.168 v1(64.984,54.168) ; C120.2@68.537,49.59 v1@69.4,50.453 ; C122.2@68.935,64.246 69.58,63.6 69.58,63.241 v1(69.599,63.222) ; C119.2@70.586,49.283 71.2,49.897 v1(71.2,50.396) ; v1(72.842,62.857) 72.854,62.869 72.854,63.889 C112.2@72.866,63.901 ; v1(74.884,63.663) 74.899,63.678 76.065,63.678 C109.2@76.08,63.694 ; v1(77.829,60.928) 77.849,60.947 77.947,60.947 C116.2@78.74,61.74 ; v1(78.159,51.94) 78.178,51.921 78.282,51.921 C118.2@79.151,51.053 ; v1(78.35,56.335) 78.361,56.347 79.651,56.347 C117.2@79.662,56.358 ; U202.8@104.339,63.327 104.363,63.304 106.099,63.304 ; C201.2@104.55,65.5 106.324,65.5 106.814,65.01 106.814,63.304 ; C210.2@113.55,55.4 114.807,55.4 114.92,55.288 ; v1(116.208,55.199) 115.008,55.199 114.92,55.288 ; R211.1@116.6,53.6 116.55,53.6 114.92,55.23 114.92,55.288 ; R205.1@117.85,47.7 119.598,47.7 119.665,47.767 v1(119.679,47.767) ; R204.1@117.9,49.6 118.054,49.754 119.692,49.754 v1(119.711,49.773)
  L1(SIG) w0.6: v1(80.831,72.171) 80.835,72.167 R109.2@80.835,70.965 ; R110.2@83.242,68.482 83.242,69.634 v1(83.262,69.654) ; J102.4@93.33,16.831 93.33,14.906 97.169,11.067 103.574,11.067 103.58,11.074 v1(105.082,11.074)
  L1(SIG) w0.75: U102.8@62.842,72.252 65.952,72.252 C107.2@66.1,72.4 C106.2@66.1,74.3 65.551,74.3 v1(64.648,73.397)
  L1(SIG) w0.8: 106.099,63.304 106.814,63.304 ; 110.371,79.393 110.903,79.393 ; R206.1@119.92,77.99 v3(119.92,79.42) ; R207.1@119.936,72.491 v3(119.936,73.975)
  L1(SIG) w1: 106.814,63.304 109.348,63.304 114.92,57.733 114.92,55.288 ; v1(110.059,79.393) 110.371,79.393
  L3(PWR) w0.5: v1(64.895,59.805) 66.369,58.33 67.904,58.33 ; v1(64.984,54.168) 67.384,54.168 68.009,53.543 ; 69.524,52.394 69.587,52.331 v1(69.587,50.472) ; v1(69.599,63.222) 69.618,63.203 70.534,63.203 ; 71.17,52.304 71.2,52.273 v1(71.2,50.396) ; v1(72.842,62.857) 72.86,62.839 72.86,60.99 ; 74.008,60.849 74.884,61.725 v1(74.884,63.663) ; 76.093,52.057 76.21,51.94 ; 76.418,59.922 76.823,59.922 v1(77.829,60.928) ; 76.435,53.664 v1(78.159,51.94) ; 76.556,56.26 76.631,56.336 v1(78.35,56.335) v1(78.35,56.335)
  L3(PWR) w1: v1(54.155,81.688) 61.289,81.688 ; v1(56.741,107.358) 56.741,106.03 63.306,99.465 63.306,83.706 61.289,81.688 ; v1(64.648,73.397) 63.285,74.76 v1(63.285,79.007) 63.285,79.691 61.289,81.688 ; v1(80.831,72.171) 83.264,74.603 87.759,79.098 ; 82.068,107.172 82.121,107.12 ; TP5.1@82.068,110.077 82.107,110.039 83.709,110.039 86.856,106.891 ; 83.052,106.293 87.759,101.586 87.759,79.098 ; v1(83.262,69.654) 87.759,74.151 87.759,79.098 ; 84.05,33.689 94.659,33.689 v1(94.668,33.679) 98.132,33.679 98.141,33.689 v1@101.572,33.689 ; v1(101.572,33.679) 104.942,33.679 105.4,33.221 ; v1(105.082,11.074) 107.105,11.074 110.731,14.7 110.731,27.89 105.4,33.221 ; v1(110.059,79.393) 124.69,79.393 131.126,85.83 ; v1(116.208,55.199) 117.902,55.199 ; v3(119.936,73.975) 125.921,73.975 131.339,79.394 ; 131.512,55.199 v1(132.442,56.129) v1(134.028,56.129) ; 131.853,98.268 136.64,93.481 J204.2@139.02,93.481 ; 132.119,61.085 126.234,55.199 117.902,55.199 ; 132.209,82.809 136.867,78.151 J202.1@139.225,78.147 ; 105.4,33.221 105.4,33.489 v1(119.679,47.767) 119.711,47.799 v1(119.711,49.773) 119.711,53.391 117.902,55.199
  L4(SIG) w0.3: v1(50.101,108.867) 51.387,108.867 52.866,107.388 55.252,107.388 v1(55.254,107.386) ; v1(56.731,113.643) 56.736,113.638 56.736,107.363 v1(56.741,107.358)
  other v1: 130.856,54.843 132.442,54.843 130.856,56.129 57.973,106.107 55.32,106.201 58.067,107.311
+5V: C5.2 C9.2 C300.2 C301.2 C302.2 C303.2 C304.2 C305.2 C306.2 C307.2 C308.2 C309.2 C310.2 C311.2 FB1.2 R1.1 R300.2 R309.2 TP4.1 U1.10 U1.11 U1.12 U300.20 U301.20 U302.20 U303.20 U304.20 U305.20 | length 49.8
  L1(SIG) w0.25: C9.2@47.439,110.705 47.43,110.714 v1(47.43,111.889) 47.482,111.889 47.727,111.644 U1.10@49.675,111.644